# Altium PCB PCB.PcbDoc (part 1 of 4)
Units mm, origin at the board's own origin, x right, y up, seen from the top; angles counter-clockwise.
Board outline 38 x 42 mm, 4 copper layers (Top Layer, Inner GND 1, Inner GND 2, Bottom Layer), stack 1.62 mm thick; 195 components, 172 nets, 763 pads, 474 vias.
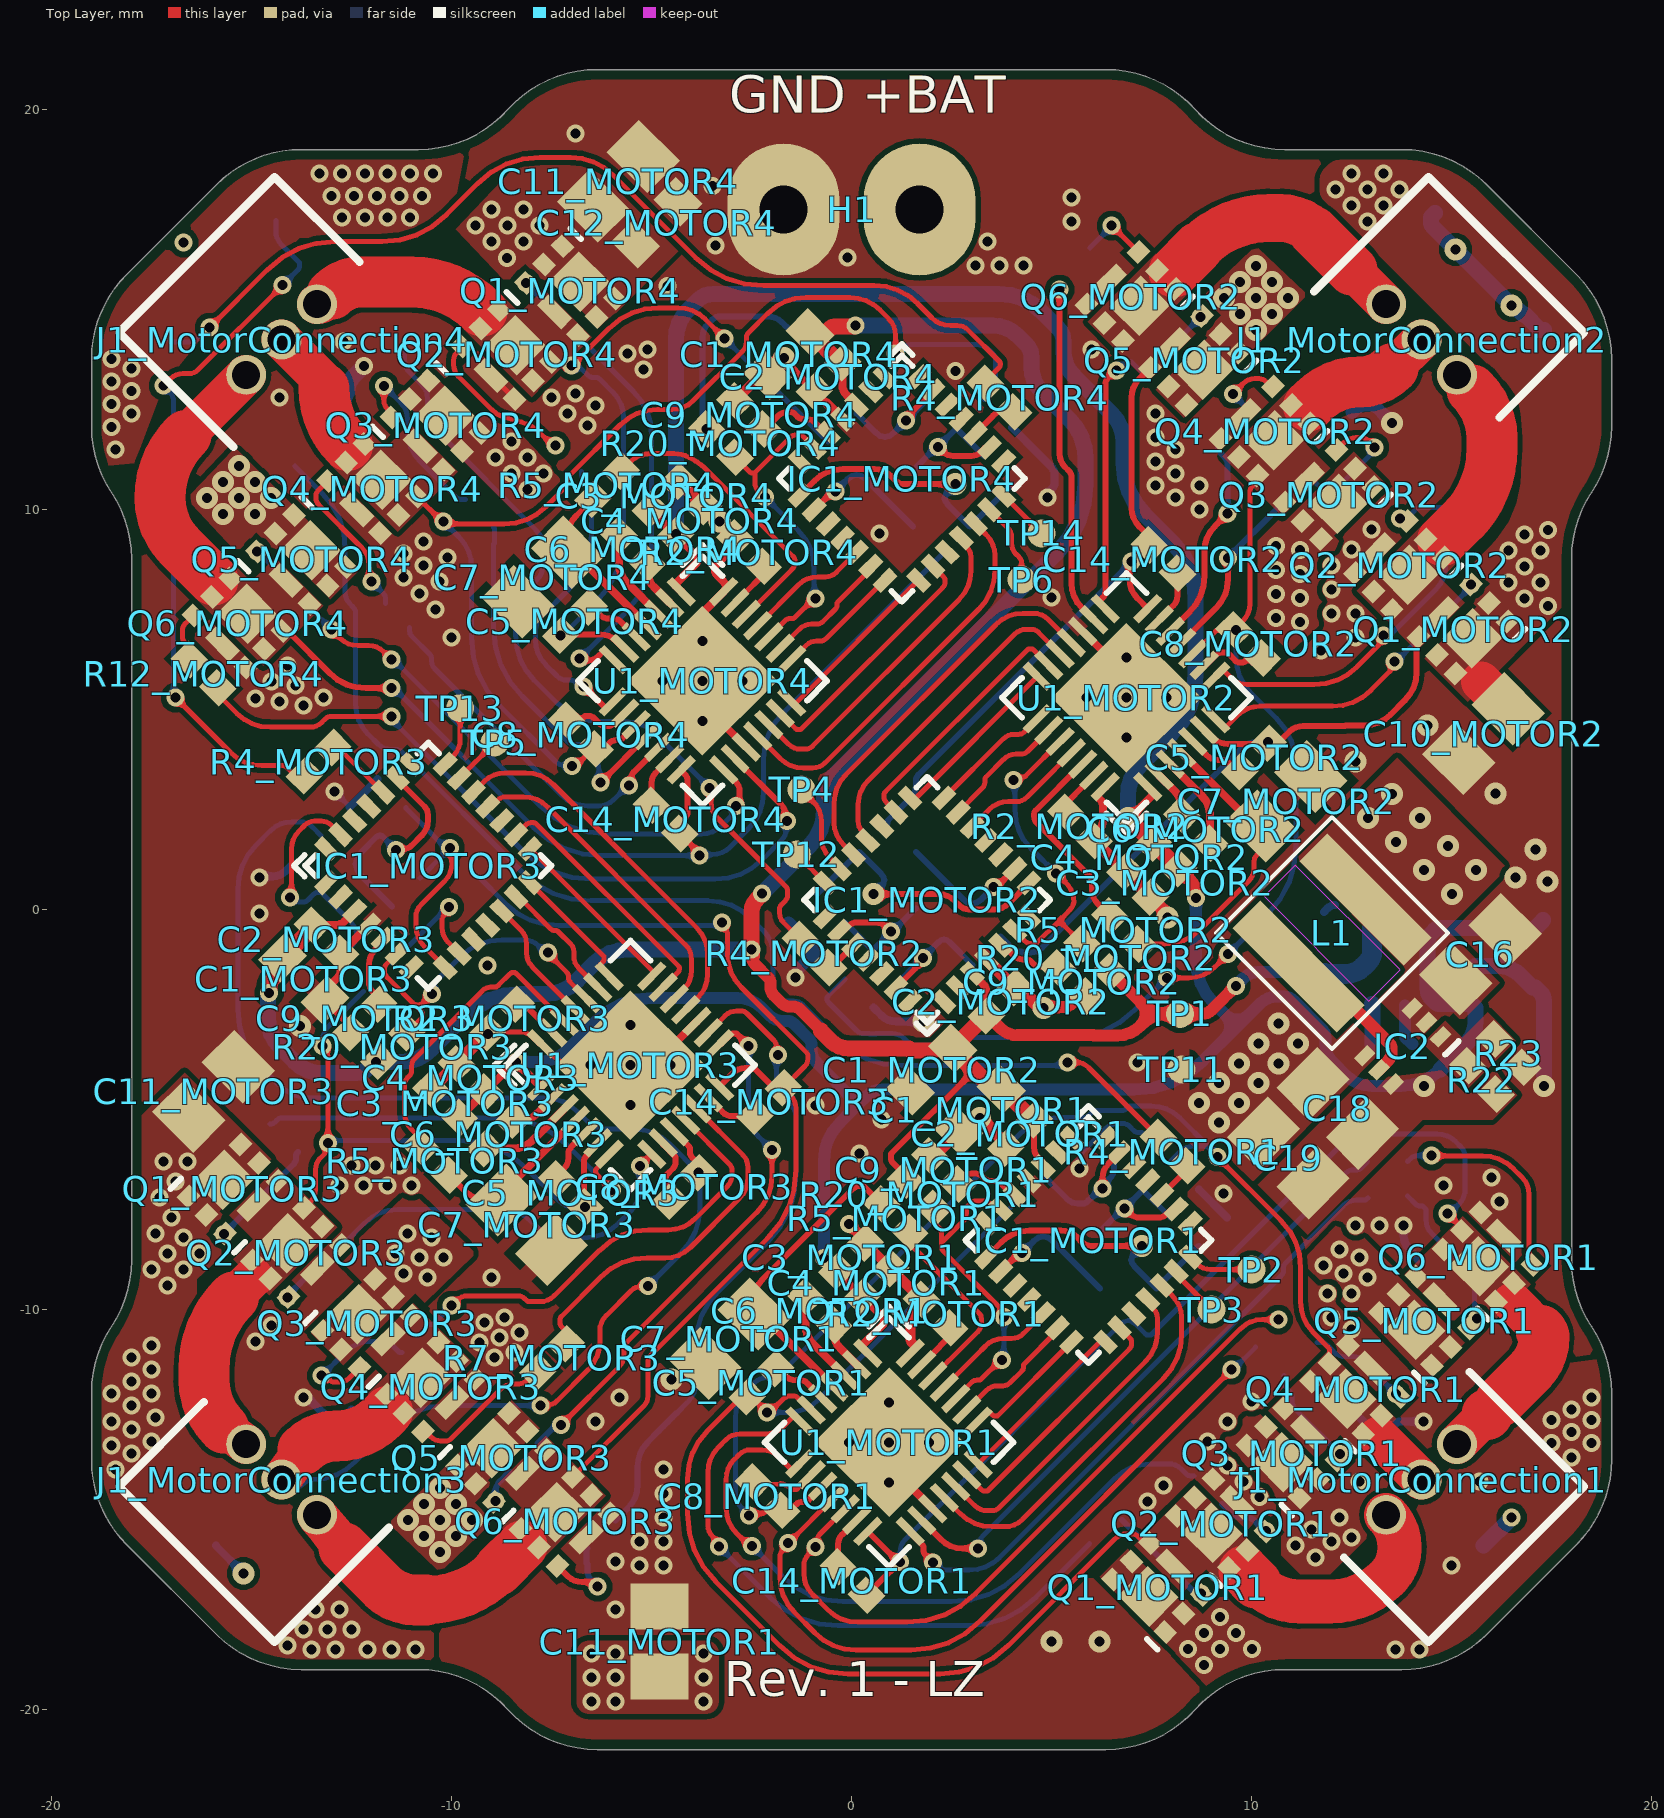
[diagram p0: Top Layer view]
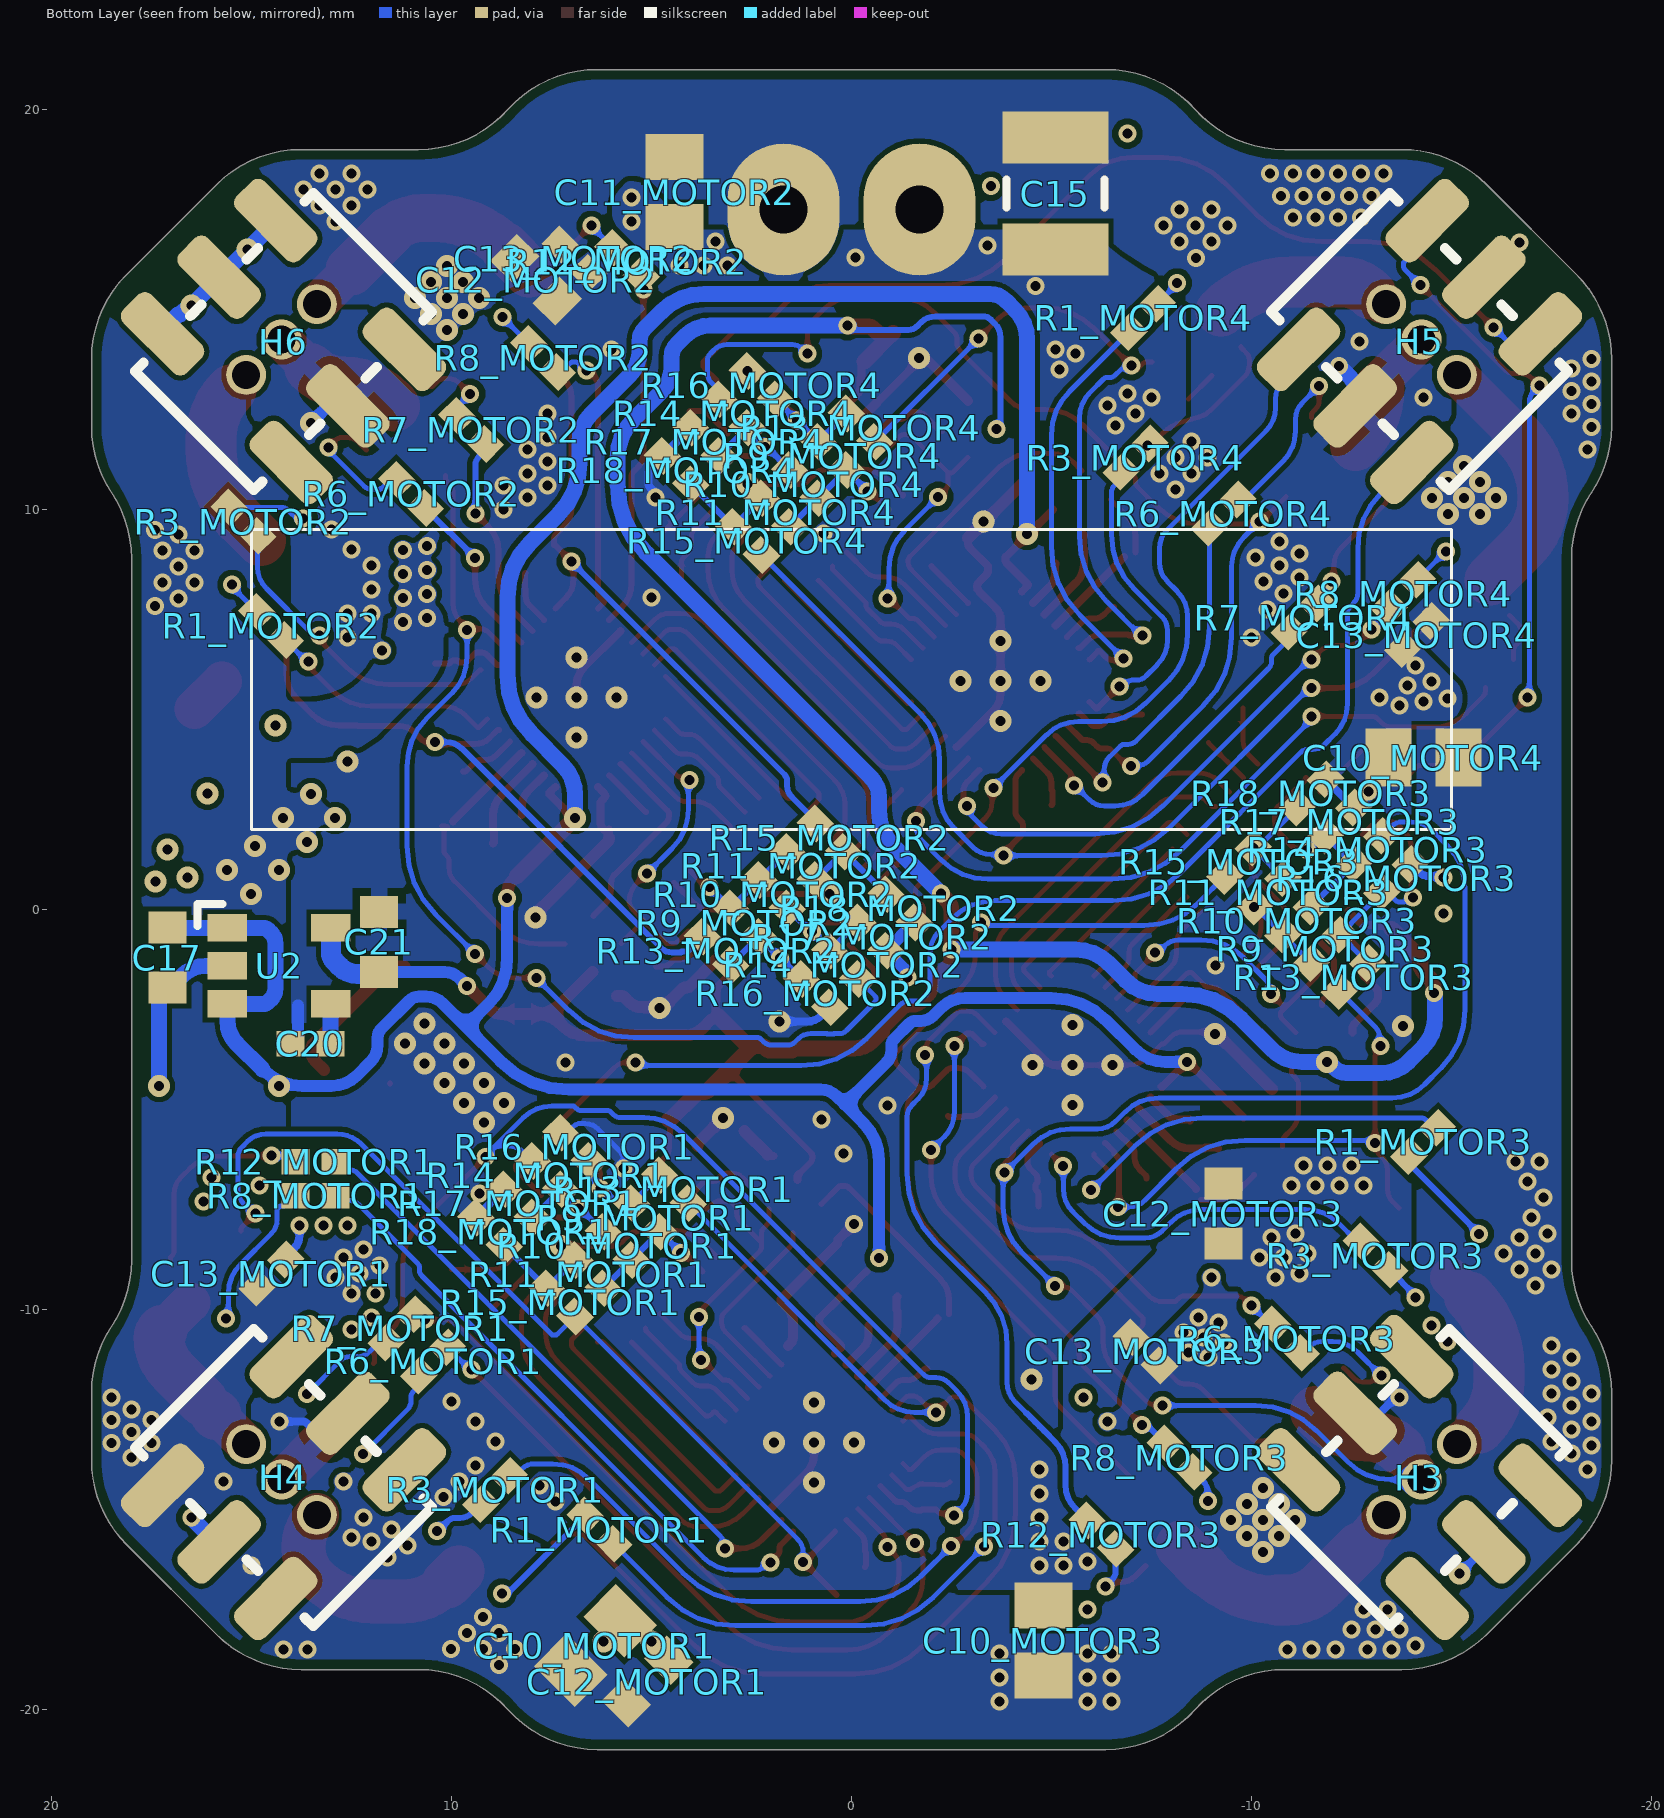
[diagram p1: Bottom Layer view, seen from below]
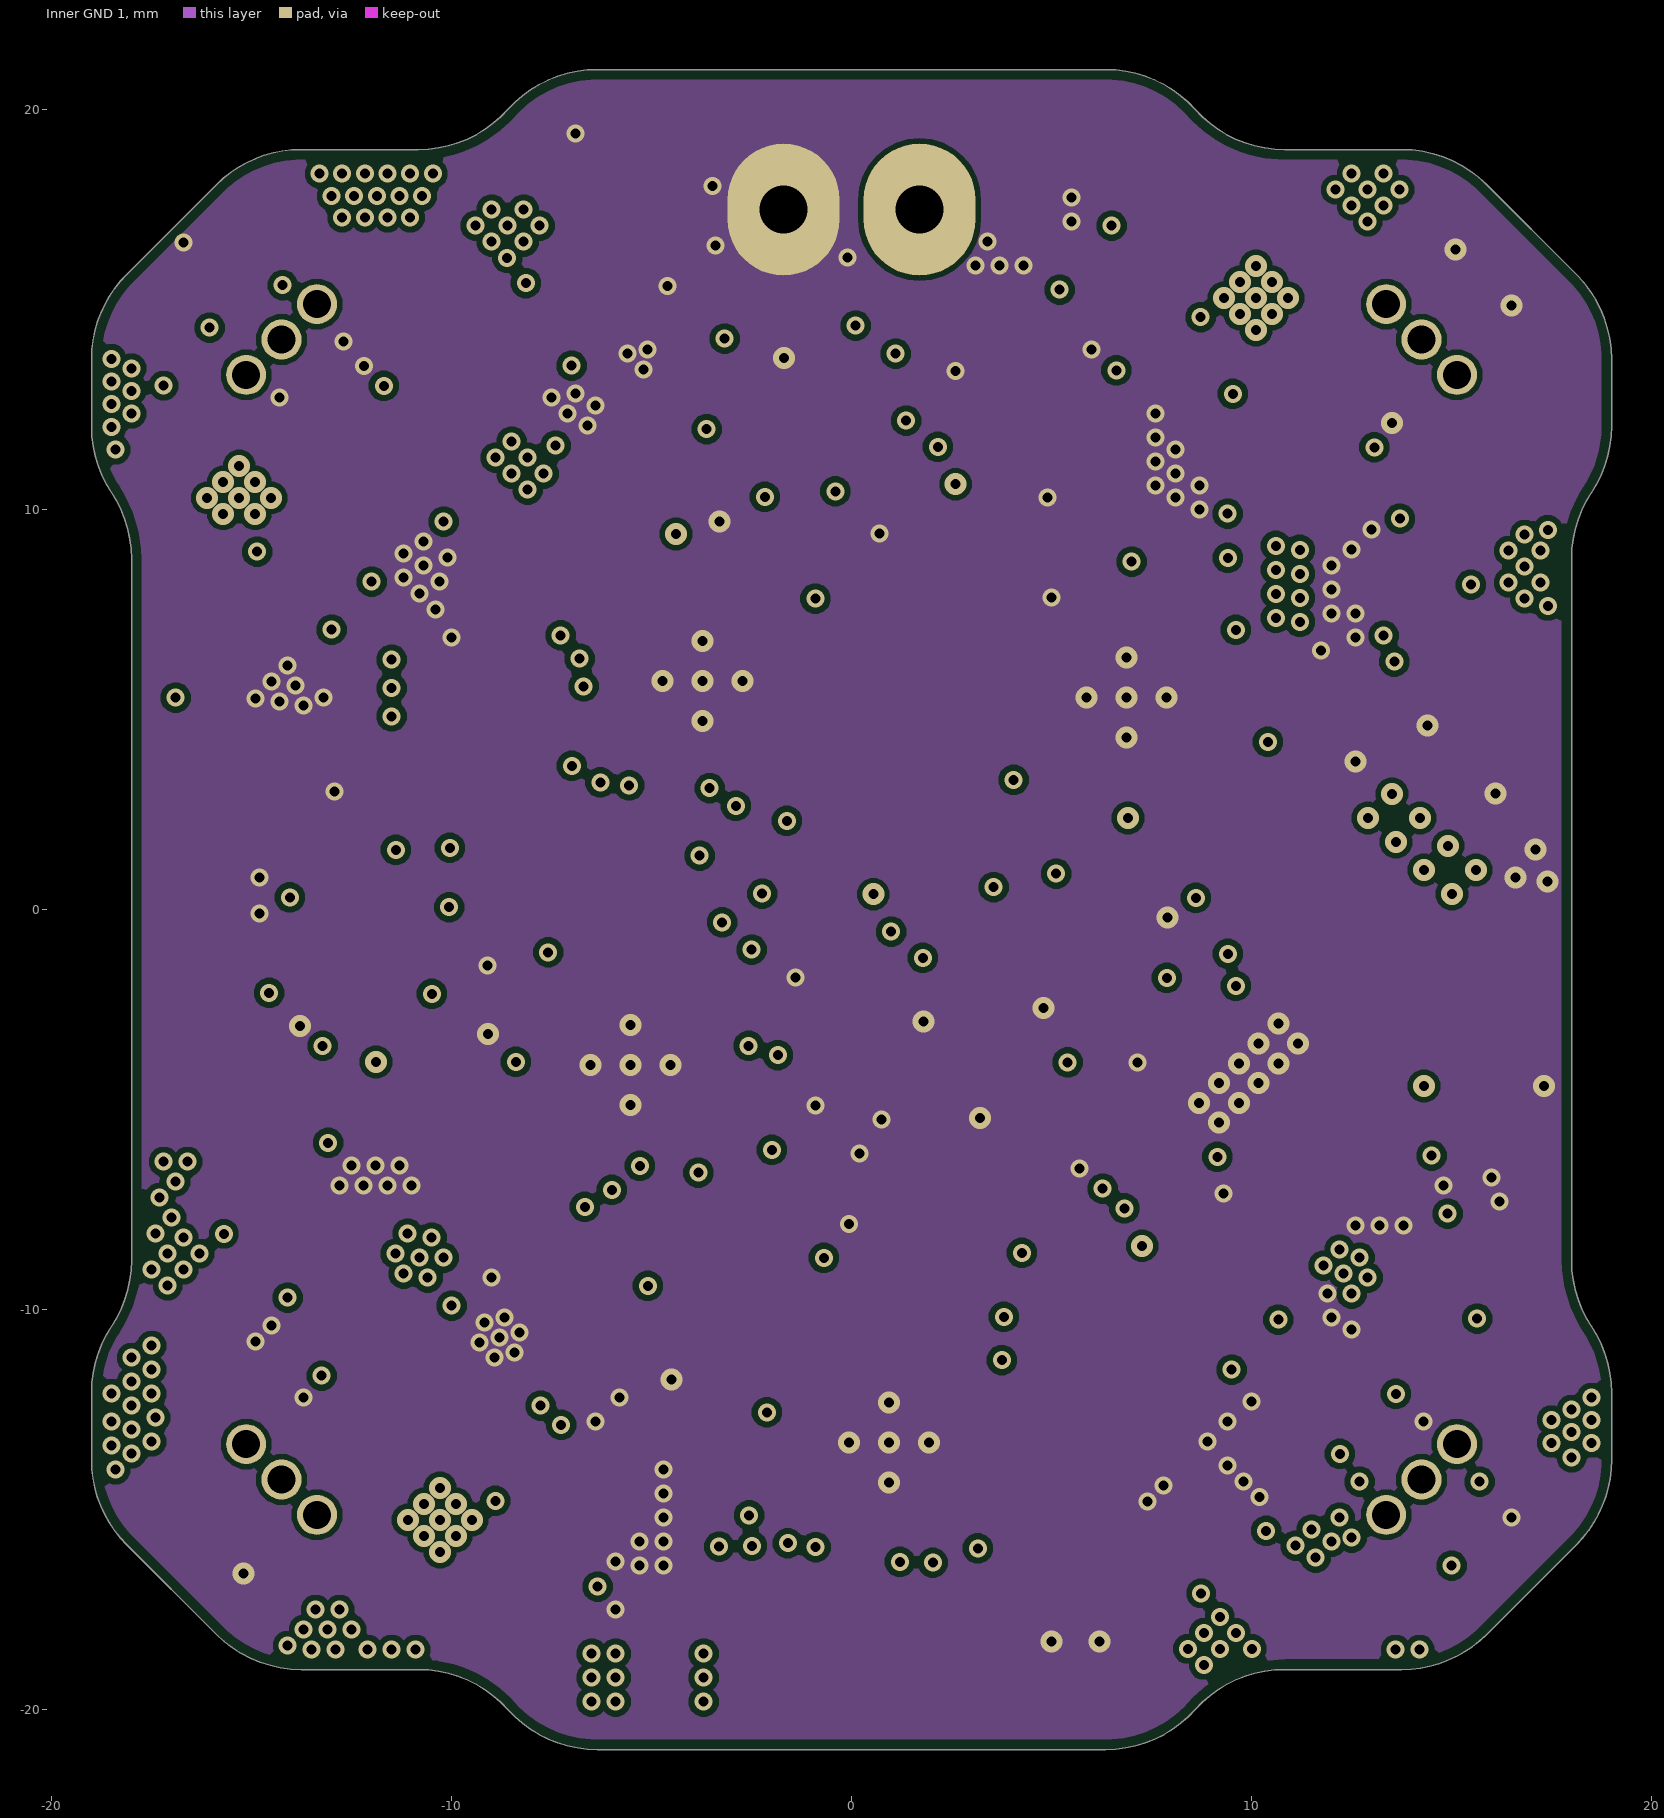
[diagram p2: Inner GND 1]
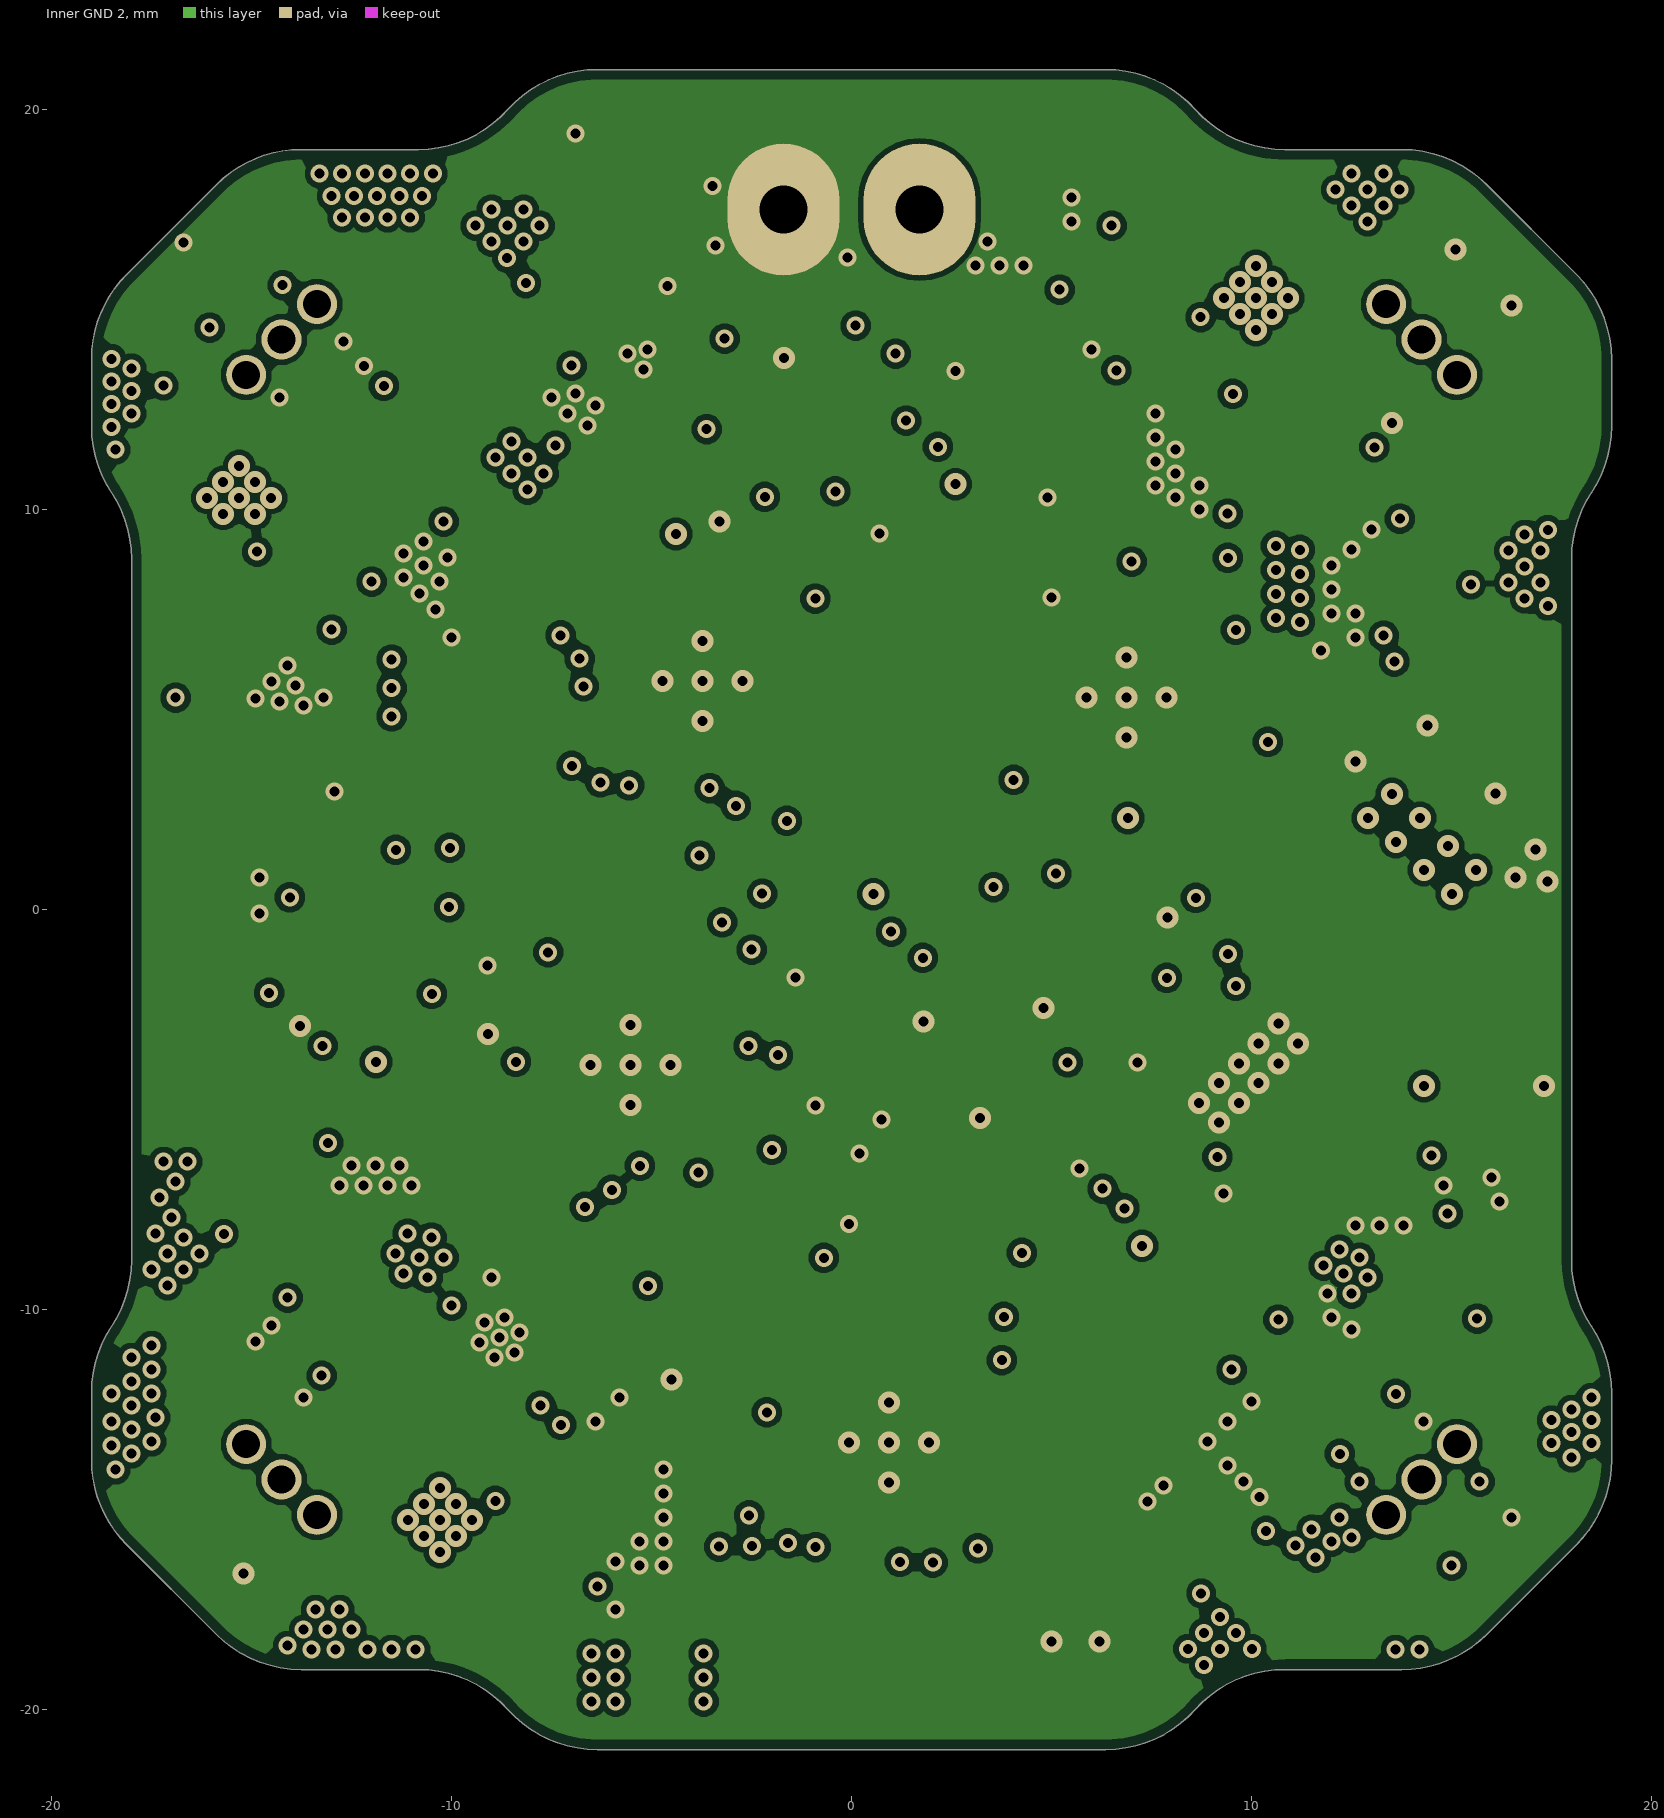
[diagram p3: Inner GND 2]

## Layer stack, top to bottom
Top Solder: solder mask 0.0102, Solder Resist, Dk 3.5
Top Layer: signal copper 0.035
Dielectric 2: prepreg 0.14, PP-006, Dk 4.1
Inner GND 1: signal copper 0.035
Dielectric 1: dielectric 1.2, FR-4, Dk 4.8
Inner GND 2: signal copper 0.035
Dielectric 3: prepreg 0.14, PP-006, Dk 4.1
Bottom Layer: signal copper 0.035
Bottom Solder: solder mask 0.0102, Solder Resist, Dk 3.5

## Board outline
-19.001,-13.756 -19.001,-12.079 cw(c-16.001,-12.079) -18.501,-10.421 ccw(c-21.001,-8.763) -18.001,-8.763 -18.001,8.765 ccw(c-21.001,8.765) -18.501,10.423 cw(c-16.001,12.082) -19.001,12.082 -19.001,13.758 cw(c-16.001,13.758) -18.123,15.88 -15.88,18.122 cw(c-13.759,16.001) -13.759,19.001 -10.83,19.001 ccw(c-10.83,22.001) -8.594,20.001 cw(c-6.358,18.001) -6.358,21.001 6.355,21.001 cw(c6.355,18.001) 8.591,20.001 ccw(c10.827,22.001) 10.827,19.001 13.756,19.001 cw(c13.756,16.001) 15.877,18.122 18.12,15.88 cw(c15.999,13.758) 18.999,13.758 18.999,12.082 cw(c15.999,12.082) 18.499,10.423 ccw(c20.999,8.765) 17.999,8.765 17.999,-8.763 ccw(c20.999,-8.763) 18.499,-10.421 cw(c15.999,-12.079) 18.999,-12.079 18.999,-13.756 cw(c15.999,-13.756) 18.12,-15.878 15.877,-18.12 cw(c13.756,-15.999) 13.756,-18.999 10.827,-18.999 ccw(c10.827,-21.999) 8.591,-19.999 cw(c6.355,-17.999) 6.355,-20.999 -6.358,-20.999 cw(c-6.358,-17.999) -8.594,-19.999 ccw(c-10.83,-21.999) -10.83,-18.999 -13.759,-18.999 cw(c-13.759,-15.999) -15.88,-18.12 -18.123,-15.878 cw(c-16.001,-13.756)

## Design rules (kind name [scope] priority, off if disabled: settings)
BoardOutlineClearance [All] p1: gap=0 ignorepadtopadclearanceinfootprint=FALSE except(0.2: Track-OutlineEdge Track-CavityEdge Track-CutoutEdge Track-SplitBarrior Track-SplitContinuation Via-OutlineEdge Via-CavityEdge Via-CutoutEdge Via-SplitBarrior Via-SplitContinuation Fill-OutlineEdge Fill-CavityEdge Fill-CutoutEdge Fill-SplitBarrior Fill-SplitContinuation; 0.25: Poly-OutlineEdge Poly-CavityEdge Poly-CutoutEdge Poly-SplitBarrior Poly-SplitContinuation)
Clearance Clearance_VBAT [InNet('+VBAT') AND OnLayer('Bottom Layer') AND InPoly vs NOT InPoly AND (NOT InNet('GND')) AND (NOT InNet('PHASE_*'))] p1 off: gap=0.3 ignorepadtopadclearanceinfootprint=FALSE
Clearance Clearance_NPTH [IsBoardCutoutRegion vs InNet('GND')] p2: gap=0.25 ignorepadtopadclearanceinfootprint=FALSE
Clearance Clearance_DiffUSB [InNet('MCU_USB_D_P') OR InNet('MCU_USB_D_N') OR InNet('USB_D_P') OR InNet('USB_D_N') or InNet('MCU_USB_TERM_D_N') or InNet('MCU_USB_TERM_D_P') vs InNet('GND')] p3: gap=0.7 ignorepadtopadclearanceinfootprint=FALSE except(0.089: SMDPad-THPad THPad-THPad; 0.127: Arc-Arc Arc-Track Arc-SMDPad Arc-THPad Arc-Text Track-Track Track-SMDPad Track-THPad Track-Text SMDPad-SMDPad SMDPad-Via SMDPad-Text THPad-Via THPad-Text Via-Text Fill-Text Poly-Text Region-Text Text-Text; 0.25: Arc-Hole Track-Hole SMDPad-Hole THPad-Hole Via-Hole Fill-Hole Poly-Hole Region-Hole Text-Hole; 0.254: Arc-Via Track-Via Via-Via)
Clearance Clearance_RF [InNet('RF') AND (IsTrack OR IsArc) vs (InNet('GND') AND InPoly)] p4: gap=0.5 ignorepadtopadclearanceinfootprint=FALSE except(0.089: SMDPad-THPad THPad-THPad; 0.127: Arc-Arc Arc-Track Arc-SMDPad Arc-THPad Arc-Text Track-Track Track-SMDPad Track-THPad Track-Text SMDPad-SMDPad SMDPad-Via SMDPad-Text THPad-Via THPad-Text Via-Text Fill-Text Poly-Text Region-Text Text-Text; 0.25: Arc-Hole Track-Hole SMDPad-Hole THPad-Hole Via-Hole Fill-Hole Poly-Hole Region-Hole Text-Hole; 0.254: Arc-Via Track-Via Via-Via)
Clearance [All] p5: gap=0.127 ignorepadtopadclearanceinfootprint=FALSE except(0.089: SMDPad-THPad THPad-THPad; 0.25: Arc-Hole Track-Hole SMDPad-Hole THPad-Hole Via-Hole Fill-Hole Poly-Hole Region-Hole Text-Hole)
ComponentClearance ComponentClearance_1 [HasFootprint('SX1280IMLTRT') vs HasFootprint('2450FM07D0034001T')] p1: gap=0.006 collisioncheckmode=3 verticalgap=0.254 showdistances=FALSE
ComponentClearance [All] p2: gap=0.127 collisioncheckmode=3 verticalgap=0.127 showdistances=FALSE
DiffPairsRouting [All] p1: maxlimit=0.254 minlimit=0.165 mostfreqgap=0.254 toplayer_maxgap=0.165 toplayer_prefgap=0.165 toplayer_minwidth=0.23 toplayer_maxwidth=0.23 toplayer_prefwidth=0.23 midlayer1_mingap=0.254 midlayer1_minwidth=0.381 midlayer1_maxwidth=0.381 midlayer1_prefwidth=0.381 midlayer2_mingap=0.254 midlayer2_minwidth=0.381 midlayer2_maxwidth=0.381 midlayer2_prefwidth=0.381 bottomlayer_mingap=0.254 bottomlayer_minwidth=0.381 bottomlayer_maxwidth=0.381 bottomlayer_prefwidth=0.381 maxuncoupledlength=12.7
MinimumAnnularRing [All] p1: minimumring=0.1
MinimumSolderMaskSliver [All] p1: minsoldermaskwidth=0.04
PlaneConnect [All] p1: planeconnectstyle=Direct reliefexpansion=0.508 reliefentries=4 reliefconductorwidth=0.254 reliefairgap=0.254
PolygonConnect PolygonConnect_GNDException [InNet('GND') vs InPadClass('GNDirect')] p1: connectstyle=Direct reliefconductorwidth=0.254 reliefentries=4 polygonreliefangle="90 Angle" airgapwidth=0.254
PolygonConnect PolygonConnect_Gnd [InNet('GND')] p2: thpad.connectstyle=Relief thpad.reliefconductorwidth=0.4 thpad.reliefentries=4 thpad.polygonreliefangle="90 Angle" thpad.airgapwidth=0.2 smdpad.connectstyle=Relief smdpad.reliefconductorwidth=0.4 smdpad.reliefentries=4 smdpad.polygonreliefangle="90 Angle" smdpad.airgapwidth=0.2 via.connectstyle=Direct via.reliefconductorwidth=0.4 via.reliefentries=4 via.polygonreliefangle="90 Angle" via.airgapwidth=0.2
PolygonConnect PolygonConnect_AllButGND [Not InNet('GND') vs Not InNet('GND')] p3: connectstyle=Direct reliefconductorwidth=0.254 reliefentries=4 polygonreliefangle="90 Angle" airgapwidth=0.254
RoomDefinition MOTOR1 [InComponentClass('MOTOR1')] p1: confinementstyle=ConfineIn formatcopy=TRUE lockcomponents=FALSE outline -5.952,-20.152 -5.952,-16.448 -5.179,-11.224 -2.56,-8.605 3.666,-3.276 14.577,-5.648 15.842,-6.671 17.93,-8.76 8.524,-18.895 6.895,-20.524 5.557,-21.033
RoomDefinition MOTOR4 [InComponentClass('MOTOR4')] p2: confinementstyle=ConfineIn formatcopy=TRUE lockcomponents=FALSE outline -17.493,6.271 -17.357,7.233 -7.952,17.714 -5.332,20.333 3.329,14.093 4.993,12.429 5.662,11.359 5.185,10.775 -3.353,1.884 -4.275,0.962 -16.152,2.648
RoomDefinition MOTOR3 [InComponentClass('MOTOR3')] p3: confinementstyle=ConfineIn formatcopy=TRUE lockcomponents=FALSE outline -18.073,-5.043 -14.618,3.329 -12.954,4.993 -10.583,5.023 -1.691,-3.516 -0.769,-4.438 -3.648,-20.127 -5.952,-20.127 -17.487,-7.055
RoomDefinition MOTOR2 [InComponentClass('MOTOR2')] p4: confinementstyle=ConfineIn formatcopy=TRUE lockcomponents=FALSE outline -2.516,-0.342 3.268,19.787 5.572,19.787 8.344,17.479 15.571,10.993 16.493,10.071 17.924,4.895 15.305,2.276 1.543,-5.733 0.267,-4.457
RoutingVias [All] p1: holewidth=0.25 width=0.55 viastyle="Through Hole" minholewidth=0.2 minwidth=0.45 maxholewidth=0.35 maxwidth=0.7
SilkToSilkClearance [All] p1: silktosilkclearance=0.15
SilkToSolderMaskClearance [IsPad] p1: minsilkscreentomaskgap=0.075 clearancetoexposedcopper=TRUE
SolderMaskExpansion [All] p1: expansion=0.038 istentingtop=FALSE
SupplyNets "Schematic Supply Nets_3" [InNet('+3V3')] p1: voltage=0.000
SupplyNets "Schematic Supply Nets_2" [InNet('+VBAT')] p2: voltage=0.000
SupplyNets "Schematic Supply Nets_1" [InNet('GND')] p3: voltage=0.000
SupplyNets "Schematic Supply Nets" [InNet('+5V')] p4: voltage=0.000
Width Width_RF [InNet('RF')] p1: maxlimit=0.25 minlimit=0.111 preferedwidth=0.25 toplayer_minwidth=0.25 midlayer1_maxwidth=0.111 midlayer1_prefwidth=0.111 midlayer2_maxwidth=0.111 midlayer2_prefwidth=0.111 bottomlayer_minwidth=0.25 impedanceprofiledriven=TRUE impedanceprofileid={F64C656D-1B4E-4BC5-BB87-F1306D944459} impedanceprofilevalue=50.000000 minimp=50.000000 maximp=50.000000 favimp=50.000000
Width [All] p2: maxlimit=1.3 minlimit=0.12 preferedwidth=0.254 toplayer_prefwidth=0.15 midlayer1_prefwidth=0.15 midlayer2_minwidth=0.2 bottomlayer_prefwidth=0.15 minimp=50.000000 maximp=50.000000 favimp=50.000000
24 further rules are at their usual default settings.

## Classes and differential pairs
net class STM_SWCLK[1..4]: STM_SWCLK1 STM_SWCLK2 STM_SWCLK3 STM_SWCLK4
polygon class GNDirectPoly: GND_BRIDGES2
pad class GNDirect: C10_MOTOR1-1 C10_MOTOR1-2 C10_MOTOR2-1 C10_MOTOR2-2 C10_MOTOR3-1 C10_MOTOR3-2 C10_MOTOR4-1 C10_MOTOR4-2 C11_MOTOR1-1 C11_MOTOR1-2 C11_MOTOR2-1 C11_MOTOR2-2 C11_MOTOR3-1 C11_MOTOR3-2 C11_MOTOR4-1 C11_MOTOR4-2 C12_MOTOR1-1 C12_MOTOR1-2 C12_MOTOR2-1 C12_MOTOR2-2 C12_MOTOR3-1 C12_MOTOR3-2 C12_MOTOR4-1 C12_MOTOR4-2 C13_MOTOR1-1 C13_MOTOR1-2 C13_MOTOR2-1 C13_MOTOR2-2 C13_MOTOR3-1 C13_MOTOR3-2 C13_MOTOR4-1 C13_MOTOR4-2 C15-1 C16-1 C18-1 C19-1 H1-1 IC2-4 Q2_MOTOR1-4 Q2_MOTOR1-8 Q2_MOTOR2-4 Q2_MOTOR2-8 Q2_MOTOR3-4 Q2_MOTOR3-8 Q2_MOTOR4-4 Q2_MOTOR4-8 Q4_MOTOR1-4 Q4_MOTOR1-8 Q4_MOTOR2-4 Q4_MOTOR2-8 Q4_MOTOR3-4 Q4_MOTOR3-8 Q4_MOTOR4-4 Q4_MOTOR4-8 Q6_MOTOR1-4 Q6_MOTOR1-8 Q6_MOTOR2-4 Q6_MOTOR2-8 Q6_MOTOR3-4 Q6_MOTOR3-8 Q6_MOTOR4-4 Q6_MOTOR4-8 R23-1
channel class MotorConnection: MotorConnection1 MotorConnection2 MotorConnection3 MotorConnection4
component class MotorConnection4: J1_MotorConnection4
component class MotorConnection3: J1_MotorConnection3
component class MotorConnection2: J1_MotorConnection2
component class MotorConnection1: J1_MotorConnection1
net class STM_SWDIO[1..4]: STM_SWDIO1 STM_SWDIO2 STM_SWDIO3 STM_SWDIO4
net class STM_nRESET[1..4]: STM_nRESET1 STM_nRESET2 STM_nRESET3 STM_nRESET4
net class STM_DSHOT[1..4]: STM_DSHOT1 STM_DSHOT2 STM_DSHOT3 STM_DSHOT4
net class PHASE_C[1..4]: PHASE_C1 PHASE_C2 PHASE_C3 PHASE_C4
net class PHASE_B[1..4]: PHASE_B1 PHASE_B2 PHASE_B3 PHASE_B4
net class PHASE_A[1..4]: PHASE_A1 PHASE_A2 PHASE_A3 PHASE_A4
channel class MotorDriverChannel: MOTOR1 MOTOR2 MOTOR3 MOTOR4
component class MOTOR4: C1_MOTOR4 C2_MOTOR4 C3_MOTOR4 C4_MOTOR4 C5_MOTOR4 C6_MOTOR4 C7_MOTOR4 C8_MOTOR4 C9_MOTOR4 C10_MOTOR4 C11_MOTOR4 C12_MOTOR4 C13_MOTOR4 C14_MOTOR4 IC1_MOTOR4 Q1_MOTOR4 Q2_MOTOR4 Q3_MOTOR4 Q4_MOTOR4 Q5_MOTOR4 Q6_MOTOR4 R1_MOTOR4 R2_MOTOR4 R3_MOTOR4 R4_MOTOR4 R5_MOTOR4 R6_MOTOR4 R7_MOTOR4 R8_MOTOR4 R9_MOTOR4 R10_MOTOR4 R11_MOTOR4 R12_MOTOR4 R13_MOTOR4 R14_MOTOR4 R15_MOTOR4 R16_MOTOR4 R17_MOTOR4 R18_MOTOR4 R20_MOTOR4 U1_MOTOR4
component class MOTOR3: C1_MOTOR3 C2_MOTOR3 C3_MOTOR3 C4_MOTOR3 C5_MOTOR3 C6_MOTOR3 C7_MOTOR3 C8_MOTOR3 C9_MOTOR3 C10_MOTOR3 C11_MOTOR3 C12_MOTOR3 C13_MOTOR3 C14_MOTOR3 IC1_MOTOR3 Q1_MOTOR3 Q2_MOTOR3 Q3_MOTOR3 Q4_MOTOR3 Q5_MOTOR3 Q6_MOTOR3 R1_MOTOR3 R2_MOTOR3 R3_MOTOR3 R4_MOTOR3 R5_MOTOR3 R6_MOTOR3 R7_MOTOR3 R8_MOTOR3 R9_MOTOR3 R10_MOTOR3 R11_MOTOR3 R12_MOTOR3 R13_MOTOR3 R14_MOTOR3 R15_MOTOR3 R16_MOTOR3 R17_MOTOR3 R18_MOTOR3 R20_MOTOR3 U1_MOTOR3
component class MOTOR2: C1_MOTOR2 C2_MOTOR2 C3_MOTOR2 C4_MOTOR2 C5_MOTOR2 C6_MOTOR2 C7_MOTOR2 C8_MOTOR2 C9_MOTOR2 C10_MOTOR2 C11_MOTOR2 C12_MOTOR2 C13_MOTOR2 C14_MOTOR2 IC1_MOTOR2 Q1_MOTOR2 Q2_MOTOR2 Q3_MOTOR2 Q4_MOTOR2 Q5_MOTOR2 Q6_MOTOR2 R1_MOTOR2 R2_MOTOR2 R3_MOTOR2 R4_MOTOR2 R5_MOTOR2 R6_MOTOR2 R7_MOTOR2 R8_MOTOR2 R9_MOTOR2 R10_MOTOR2 R11_MOTOR2 R12_MOTOR2 R13_MOTOR2 R14_MOTOR2 R15_MOTOR2 R16_MOTOR2 R17_MOTOR2 R18_MOTOR2 R20_MOTOR2 U1_MOTOR2
component class MOTOR1: C1_MOTOR1 C2_MOTOR1 C3_MOTOR1 C4_MOTOR1 C5_MOTOR1 C6_MOTOR1 C7_MOTOR1 C8_MOTOR1 C9_MOTOR1 C10_MOTOR1 C11_MOTOR1 C12_MOTOR1 C13_MOTOR1 C14_MOTOR1 IC1_MOTOR1 Q1_MOTOR1 Q2_MOTOR1 Q3_MOTOR1 Q4_MOTOR1 Q5_MOTOR1 Q6_MOTOR1 R1_MOTOR1 R2_MOTOR1 R3_MOTOR1 R4_MOTOR1 R5_MOTOR1 R6_MOTOR1 R7_MOTOR1 R8_MOTOR1 R9_MOTOR1 R10_MOTOR1 R11_MOTOR1 R12_MOTOR1 R13_MOTOR1 R14_MOTOR1 R15_MOTOR1 R16_MOTOR1 R17_MOTOR1 R18_MOTOR1 R20_MOTOR1 U1_MOTOR1
component class U_Interfacing: H3 H4 H5 H6 TP1 TP2 TP3 TP4 TP5 TP6 TP11 TP12 TP13 TP14
component class U_Power: C15 C16 C17 C18 C19 C20 C21 H1 IC2 L1 R22 R23 U2

## Components (designator, comment, footprint, x,y, rotation, side; value= is the part's Value field where it differs from the comment)
C1_MOTOR1 "4u7" CAP_0603_L 3.209,-5.009 r45 top (schematic designator C1)
C1_MOTOR2 "4u7" CAP_0603_L 2,-4 r45 top (schematic designator C1)
C1_MOTOR3 "4u7" CAP_0603_L -13.694,-1.733 r135 top (schematic designator C1)
C1_MOTOR4 "4u7" CAP_0603_L -1.571,13.887 r45 top (schematic designator C1)
C2_MOTOR1 "100n" CAP_0402 4.209,-5.609 r45 top (schematic designator C2)
C2_MOTOR2 "100n" CAP_0402 3.727,-2.304 r225 top (schematic designator C2)
C2_MOTOR3 "100n" CAP_0402 -13.129,-0.743 r135 top (schematic designator C2)
C2_MOTOR4 "100n" CAP_0402 -0.581,13.321 r45 top (schematic designator C2)
C3_MOTOR1 "1u" CAP_0402 -0.018,-8.689 r225 top (schematic designator C3)
C3_MOTOR2 "1u" CAP_0402 7.828,0.666 r45 top (schematic designator C3)
C3_MOTOR3 "1u" CAP_0402 -10.159,-4.844 r315 top (schematic designator C3)
C3_MOTOR4 "1u" CAP_0402 -4.682,10.351 r225 top (schematic designator C3)
C4_MOTOR1 "100n" CAP_0402 0.619,-9.326 r225 top (schematic designator C4)
C4_MOTOR2 "100n" CAP_0402 7.191,1.302 r45 top (schematic designator C4)
C4_MOTOR3 "100n" CAP_0402 -9.522,-4.208 r315 top (schematic designator C4)
C4_MOTOR4 "100n" CAP_0402 -4.046,9.715 r225 top (schematic designator C4)
C5_MOTOR1 "100n" CAP_0402 -2.255,-11.829 r45 top (schematic designator C5)
C5_MOTOR2 "100n" CAP_0402 10.065,3.806 r225 top (schematic designator C5)
C5_MOTOR3 "100n" CAP_0402 -7.019,-7.081 r135 top (schematic designator C5)
C5_MOTOR4 "100n" CAP_0402 -6.919,7.211 r45 top (schematic designator C5)
C6_MOTOR1 "470n" CAP_0402 -0.796,-10.033 r135 top (schematic designator C6)
C6_MOTOR2 "470n" CAP_0402 8.606,2.009 r315 top (schematic designator C6)
C6_MOTOR3 "470n" CAP_0402 -8.815,-5.622 r225 top (schematic designator C6)
C6_MOTOR4 "470n" CAP_0402 -5.46,9.008 r135 top (schematic designator C6)
C7_MOTOR1 "10u" CAP_0805s -3.055,-10.729 r45 top (schematic designator C7)
C7_MOTOR2 "10u" CAP_0805s 10.865,2.706 r225 top (schematic designator C7)
C7_MOTOR3 "10u" CAP_0805s -8.119,-7.881 r135 top (schematic designator C7)
C7_MOTOR4 "10u" CAP_0805s -7.719,8.311 r45 top (schematic designator C7)
C8_MOTOR1 "100n" CAP_0402 -2.104,-14.664 r135 top (schematic designator C8)
C8_MOTOR2 "100n" CAP_0402 9.914,6.641 r315 top (schematic designator C8)
C8_MOTOR3 "100n" CAP_0402 -4.184,-6.93 r225 top (schematic designator C8)
C8_MOTOR4 "100n" CAP_0402 -6.768,4.376 r135 top (schematic designator C8)
C9_MOTOR1 "100n" CAP_0402 2.309,-6.509 r315 top (schematic designator C9)
C9_MOTOR2 "100n" CAP_0402 5.509,-1.809 r135 top (schematic designator C9)
C9_MOTOR3 "100n" CAP_0402 -12.174,-2.723 r45 top (schematic designator C9)
C9_MOTOR4 "100n" CAP_0402 -2.561,12.366 r315 top (schematic designator C9)
C10_MOTOR1 "22uF" CAP_0805s 6.4,-18.4 r315 bottom (schematic designator C10)
C10_MOTOR2 "22uF" CAP_0805s 15.8,4.4 r45 top (schematic designator C10)
C10_MOTOR3 "22uF" CAP_0805s -4.8,-18.275 r270 bottom (schematic designator C10)
C10_MOTOR4 "22uF" CAP_0805s -14.3,3.8 r180 bottom (schematic designator C10)
C11_MOTOR1 "22uF" CAP_0805s -4.8,-18.3 r270 top (schematic designator C11)
C11_MOTOR2 "22uF" CAP_0805s 4.42,17.935 r90 bottom (schematic designator C11)
C11_MOTOR3 "22uF" CAP_0805s -15.949,-4.548 r225 top (schematic designator C11)
C11_MOTOR4 "22uF" CAP_0805s -5.827,18.209 r225 top (schematic designator C11)
C12_MOTOR1 "1u" CAP_0603_L 5.1,-19.3 r315 bottom (schematic designator C12)
C12_MOTOR2 "1u" CAP_0603_L 7.887,15.746 r45 bottom (schematic designator C12)
C12_MOTOR3 "1u" CAP_0603_L -9.3,-7.6 r270 bottom (schematic designator C12)
C12_MOTOR4 "1u" CAP_0603_L -4.871,17.168 r225 top (schematic designator C12)
C13_MOTOR1 "100n" CAP_0402 14.5,-9.1 r315 bottom (schematic designator C13)
C13_MOTOR2 "100n" CAP_0402 6.926,16.271 r45 bottom (schematic designator C13)
C13_MOTOR3 "100n" CAP_0402 -7.346,-11.046 r45 bottom (schematic designator C13)
C13_MOTOR4 "100n" CAP_0402 -14.137,6.859 r135 bottom (schematic designator C13)
C14_MOTOR1 "100n" CAP_0402 0.018,-16.786 r135 top (schematic designator C14)
C14_MOTOR2 "100n" CAP_0402 7.792,8.762 r315 top (schematic designator C14)
C14_MOTOR3 "100n" CAP_0402 -2.062,-4.809 r225 top (schematic designator C14)
C14_MOTOR4 "100n" CAP_0402 -4.647,2.255 r135 top (schematic designator C14)
C15 "100u" CAP_1210 -5.1,17.9 r90 bottom
C16 "10u" CAP_0805s 15.723,-1.117 r225 top
C17 "2u2" CAP_0603_L 17.101,-1.2 r90 bottom
C18 "22uF" CAP_0805s 12.155,-4.971 r315 top
C19 "22uF" CAP_0805s 10.918,-6.208 r315 top
C20 "100n" CAP_0402 13.529,-3.356 r180 bottom
C21 "2u2" CAP_0603_L 11.809,-0.809 r270 bottom
H1 "BatteryWireSoldering" BatteryWireSoldering 0,17.5 r0 top
H3 "NRPN032MAMS-RC" NRPN032MAMS-RC -14.2,-14.2 r135 bottom locked
H4 "NRPN032MAMS-RC" NRPN032MAMS-RC 14.2,-14.2 r225 bottom locked
H5 "NRPN032MAMS-RC" NRPN032MAMS-RC -14.2,14.2 r225 bottom locked
H6 "NRPN032MAMS-RC" NRPN032MAMS-RC 14.2,14.2 r135 bottom locked
IC1_MOTOR1 "STM32G071GBU6" UFQFN28-STM32 5.922,-8.265 r315 top (schematic designator IC1)
IC1_MOTOR2 "STM32G071GBU6" UFQFN28-STM32 1.888,0.242 r135 top (schematic designator IC1)
IC1_MOTOR3 "STM32G071GBU6" UFQFN28-STM32 -10.583,1.095 r45 top (schematic designator IC1)
IC1_MOTOR4 "STM32G071GBU6" UFQFN28-STM32 1.258,10.775 r315 top (schematic designator IC1)
IC2 "TPS61023DRLT" SOTFL50P160X60-6N 13.778,-3.415 r225 top
J1_MotorConnection1 "53048-0310" SHDRRA3W35P0X125_1X3_550X550X350P 14.25,-14.25 r225 top locked (schematic designator J1)
J1_MotorConnection2 "53048-0310" SHDRRA3W35P0X125_1X3_550X550X350P 14.25,14.25 r315 top locked (schematic designator J1)
J1_MotorConnection3 "53048-0310" SHDRRA3W35P0X125_1X3_550X550X350P -14.25,-14.25 r135 top locked (schematic designator J1)
J1_MotorConnection4 "53048-0310" SHDRRA3W35P0X125_1X3_550X550X350P -14.25,14.25 r45 top locked (schematic designator J1)
L1 "1u" 74438357010 12.01,-0.587 r45 top
Q1_MOTOR1 "CSD15571Q2" CSD15571Q2 7.649,-16.945 r45 top (schematic designator Q1)
Q1_MOTOR2 "CSD15571Q2" CSD15571Q2 15.288,7.013 r135 top (schematic designator Q1)
Q1_MOTOR3 "CSD15571Q2" CSD15571Q2 -15.469,-6.984 r315 top (schematic designator Q1)
Q1_MOTOR4 "CSD15571Q2" CSD15571Q2 -7.031,15.471 r225 top (schematic designator Q1)
Q2_MOTOR1 "CSD15571Q2" CSD15571Q2 9.24,-15.354 r45 top (schematic designator Q2)
Q2_MOTOR2 "CSD15571Q2" CSD15571Q2 13.697,8.604 r135 top (schematic designator Q2)
Q2_MOTOR3 "CSD15571Q2" CSD15571Q2 -13.878,-8.575 r315 top (schematic designator Q2)
Q2_MOTOR4 "CSD15571Q2" CSD15571Q2 -8.622,13.88 r225 top (schematic designator Q2)
Q3_MOTOR1 "CSD15571Q2" CSD15571Q2 11.008,-13.587 r45 top (schematic designator Q3)
Q3_MOTOR2 "CSD15571Q2" CSD15571Q2 11.93,10.372 r135 top (schematic designator Q3)
Q3_MOTOR3 "CSD15571Q2" CSD15571Q2 -12.111,-10.343 r315 top (schematic designator Q3)
Q3_MOTOR4 "CSD15571Q2" CSD15571Q2 -10.39,12.112 r225 top (schematic designator Q3)
Q4_MOTOR1 "CSD15571Q2" CSD15571Q2 12.599,-11.996 r45 top (schematic designator Q4)
Q4_MOTOR2 "CSD15571Q2" CSD15571Q2 10.339,11.963 r135 top (schematic designator Q4)
Q4_MOTOR3 "CSD15571Q2" CSD15571Q2 -10.519,-11.934 r315 top (schematic designator Q4)
Q4_MOTOR4 "CSD15571Q2" CSD15571Q2 -11.981,10.521 r225 top (schematic designator Q4)
Q5_MOTOR1 "CSD15571Q2" CSD15571Q2 14.321,-10.28 r45 top (schematic designator Q5)
Q5_MOTOR2 "CSD15571Q2" CSD15571Q2 8.571,13.731 r135 top (schematic designator Q5)
Q5_MOTOR3 "CSD15571Q2" CSD15571Q2 -8.752,-13.702 r315 top (schematic designator Q5)
Q5_MOTOR4 "CSD15571Q2" CSD15571Q2 -13.748,8.753 r225 top (schematic designator Q5)
Q6_MOTOR1 "CSD15571Q2" CSD15571Q2 15.912,-8.689 r45 top (schematic designator Q6)
Q6_MOTOR2 "CSD15571Q2" CSD15571Q2 6.98,15.322 r135 top (schematic designator Q6)
Q6_MOTOR3 "CSD15571Q2" CSD15571Q2 -7.161,-15.293 r315 top (schematic designator Q6)
Q6_MOTOR4 "CSD15571Q2" CSD15571Q2 -15.339,7.162 r225 top (schematic designator Q6)
R1_MOTOR1 "4R7" RES_0402 6.3,-15.5 r45 bottom (schematic designator R1)
R1_MOTOR2 "4R7" RES_0402 14.509,7.091 r45 bottom (schematic designator R1)
R1_MOTOR3 "4R7" RES_0402 -14.291,-5.809 r315 bottom (schematic designator R1)
R1_MOTOR4 "4R7" RES_0402 -7.291,14.791 r135 bottom (schematic designator R1)
R2_MOTOR1 "0R" RES_0402 2.104,-10.104 r315 top (schematic designator R2)
R2_MOTOR2 "0R" RES_0402 5.707,2.08 r135 top (schematic designator R2)
R2_MOTOR3 "0R" RES_0402 -8.744,-2.723 r45 top (schematic designator R2)
R2_MOTOR4 "0R" RES_0402 -2.561,8.937 r315 top (schematic designator R2)
R3_MOTOR1 "4R7" RES_0402 8.909,-14.509 r315 bottom (schematic designator R3)
R3_MOTOR2 "4R7" RES_0402 15.2,9.7 r45 bottom (schematic designator R3)
R3_MOTOR3 "4R7" RES_0402 -13.099,-8.652 r225 bottom (schematic designator R3)
R3_MOTOR4 "4R7" RES_0402 -7.1,11.3 r135 bottom (schematic designator R3)
R4_MOTOR1 "2k2" RES_0402 8.028,-6.051 r135 top (schematic designator R4)
R4_MOTOR2 "2k2" RES_0402 -0.929,-1.094 r135 top (schematic designator R4)
R4_MOTOR3 "2k2" RES_0402 -13.325,3.7 r225 top (schematic designator R4)
R4_MOTOR4 "2k2" RES_0402 3.7,12.8 r135 top (schematic designator R4)
R5_MOTOR1 "100k" RES_0402 1.104,-7.714 r135 top (schematic designator R5)
R5_MOTOR2 "100k" RES_0402 6.809,-0.509 r315 top (schematic designator R5)
R5_MOTOR3 "100k" RES_0402 -10.419,-6.281 r315 top (schematic designator R5)
R5_MOTOR4 "100k" RES_0402 -6.119,10.611 r225 top (schematic designator R5)
R6_MOTOR1 "4R7" RES_0402 10.457,-11.293 r315 bottom (schematic designator R6)
R6_MOTOR2 "4R7" RES_0402 11.009,10.391 r45 bottom (schematic designator R6)
R6_MOTOR3 "4R7" RES_0402 -10.888,-10.726 r225 bottom (schematic designator R6)
R6_MOTOR4 "4R7" RES_0402 -9.3,9.9 r135 bottom (schematic designator R6)
R7_MOTOR1 "4R7" RES_0402 11.28,-10.47 r315 bottom (schematic designator R7)
R7_MOTOR2 "4R7" RES_0402 9.509,11.991 r45 bottom (schematic designator R7)
R7_MOTOR3 "4R7" RES_0402 -7.491,-11.209 r225 top (schematic designator R7)
R7_MOTOR4 "4R7" RES_0402 -11.3,7.3 r135 bottom (schematic designator R7)
R8_MOTOR1 "4R7" RES_0402 13.396,-7.156 r0 bottom (schematic designator R8)
R8_MOTOR2 "4R7" RES_0402 7.709,13.791 r45 bottom (schematic designator R8)
R8_MOTOR3 "4R7" RES_0402 -8.2,-13.7 r225 bottom (schematic designator R8)
R8_MOTOR4 "4R7" RES_0402 -13.791,7.891 r135 bottom (schematic designator R8)
R9_MOTOR1 "10k" RES_0402 5.144,-7.699 r225 bottom (schematic designator R9)
R9_MOTOR2 "10k" RES_0402 2.666,-0.324 r45 bottom (schematic designator R9)
R9_MOTOR3 "10k" RES_0402 -11.849,-0.982 r315 bottom (schematic designator R9)
R9_MOTOR4 "10k" RES_0402 0.48,11.341 r225 bottom (schematic designator R9)
R10_MOTOR1 "10k" RES_0402 5.851,-8.407 r225 bottom (schematic designator R10)
R10_MOTOR2 "10k" RES_0402 1.959,0.383 r45 bottom (schematic designator R10)
R10_MOTOR3 "10k" RES_0402 -11.141,-0.275 r315 bottom (schematic designator R10)
R10_MOTOR4 "10k" RES_0402 1.187,10.634 r225 bottom (schematic designator R10)
R11_MOTOR1 "10k" RES_0402 6.558,-9.114 r225 bottom (schematic designator R11)
R11_MOTOR2 "10k" RES_0402 1.252,1.09 r45 bottom (schematic designator R11)
R11_MOTOR3 "10k" RES_0402 -10.434,0.432 r315 bottom (schematic designator R11)
R11_MOTOR4 "10k" RES_0402 1.894,9.927 r225 bottom (schematic designator R11)
R12_MOTOR1 "4R7" RES_0402 13.4,-6.3 r0 bottom (schematic designator R12)
R12_MOTOR2 "4R7" RES_0402 5.609,16.191 r45 bottom (schematic designator R12)
R12_MOTOR3 "4R7" RES_0402 -6.25,-15.625 r225 bottom (schematic designator R12)
R12_MOTOR4 "4R7" RES_0402 -16.2,5.9 r135 top (schematic designator R12)
R13_MOTOR1 "10k" RES_0402 4.437,-6.992 r45 bottom (schematic designator R13)
R13_MOTOR2 "10k" RES_0402 3.373,-1.031 r225 bottom (schematic designator R13)
R13_MOTOR3 "10k" RES_0402 -12.556,-1.689 r135 bottom (schematic designator R13)
R13_MOTOR4 "10k" RES_0402 -0.227,12.048 r45 bottom (schematic designator R13)
R14_MOTOR1 "10k" RES_0402 7.619,-6.639 r225 bottom (schematic designator R14)
R14_MOTOR2 "10k" RES_0402 0.191,-1.385 r45 bottom (schematic designator R14)
R14_MOTOR3 "10k" RES_0402 -12.909,1.492 r315 bottom (schematic designator R14)
R14_MOTOR4 "10k" RES_0402 2.955,12.402 r225 bottom (schematic designator R14)
R15_MOTOR1 "10k" RES_0402 7.265,-9.821 r45 bottom (schematic designator R15)
R15_MOTOR2 "10k" RES_0402 0.545,1.797 r225 bottom (schematic designator R15)
R15_MOTOR3 "10k" RES_0402 -9.691,1.191 r135 bottom (schematic designator R15)
R15_MOTOR4 "10k" RES_0402 2.601,9.22 r45 bottom (schematic designator R15)
R16_MOTOR1 "2k2" RES_0402 6.912,-5.932 r225 bottom (schematic designator R16)
R16_MOTOR2 "2k2" RES_0402 0.898,-2.092 r45 bottom (schematic designator R16)
R16_MOTOR3 "2k2" RES_0402 -13.616,0.785 r315 bottom (schematic designator R16)
R16_MOTOR4 "2k2" RES_0402 2.248,13.109 r225 bottom (schematic designator R16)
R17_MOTOR1 "2k2" RES_0402 8.326,-7.346 r225 bottom (schematic designator R17)
R17_MOTOR2 "2k2" RES_0402 -0.516,-0.678 r45 bottom (schematic designator R17)
R17_MOTOR3 "2k2" RES_0402 -12.202,2.2 r315 bottom (schematic designator R17)
R17_MOTOR4 "2k2" RES_0402 3.662,11.695 r225 bottom (schematic designator R17)
R18_MOTOR1 "2k2" RES_0402 9.033,-8.053 r225 bottom (schematic designator R18)
R18_MOTOR2 "2k2" RES_0402 -1.223,0.03 r45 bottom (schematic designator R18)
R18_MOTOR3 "2k2" RES_0402 -11.495,2.907 r315 bottom (schematic designator R18)
R18_MOTOR4 "2k2" RES_0402 4.369,10.988 r225 bottom (schematic designator R18)
R20_MOTOR1 "22k" RES_0402 1.703,-7.115 r135 top (schematic designator R20)
R20_MOTOR2 "22k" RES_0402 6.115,-1.203 r315 top (schematic designator R20)
R20_MOTOR3 "22k" RES_0402 -11.467,-3.43 r225 top (schematic designator R20)
R20_MOTOR4 "22k" RES_0402 -3.268,11.659 r135 top (schematic designator R20)
R22 "768k" RES_0402 15.757,-4.257 r315 top
R23 "100k" RES_0402 16.426,-3.588 r135 top
TP1 "TestPoint" TestPoint 8.214,-2.609 r90 top
TP2 "TestPoint" TestPoint 10,-9 r90 top
TP3 "TestPoint" TestPoint 9,-10 r90 top
TP4 "TestPoint" TestPoint -1.25,3 r90 top
TP5 "TestPoint" TestPoint -8.924,4.175 r90 top
TP6 "TestPoint" TestPoint 4.25,8.25 r90 top
TP11 "TestPoint" TestPoint 8.25,-4 r90 top
TP12 "TestPoint" TestPoint -1.368,1.378 r90 top
TP13 "TestPoint" TestPoint -9.784,5.034 r90 top
TP14 "TestPoint" TestPoint 4.75,9.404 r90 top
U1_MOTOR1 "MP6531AGR-Z" MP6531A-QFN40P400X400X100-29N 0.937,-13.321 r315 top (schematic designator U1)
U1_MOTOR2 "MP6531AGR-Z" MP6531A-QFN40P400X400X100-29N 6.873,5.297 r135 top (schematic designator U1)
U1_MOTOR3 "MP6531AGR-Z" MP6531A-QFN40P400X400X100-29N -5.527,-3.89 r45 top (schematic designator U1)
U1_MOTOR4 "MP6531AGR-Z" MP6531A-QFN40P400X400X100-29N -3.727,5.72 r315 top (schematic designator U1)
U2 "MIC5323-3.3YD5-TR" SPX3819M5-L-3-3/TR 14.309,-1.409 r270 bottom

## Footprints (in the part's own frame and the unit in brackets; to place one, negate y for a bottom-side part, rotate by r counter-clockwise, add the part's x,y. Pads: shape width x height; smd on the part's side, far side on the other; paste and mask are expansions set on the pad)
74438357010 [mm] "Power Inductors - SMD WE-MAPI 1uH 7.4A DCR=13.5mOhms AEC-Q200"
  rect 0.98x3.7 smd: 1(-1.185,0) 2(1.185,0)
  silkscreen extent -2.05,-2.05 2.05,2.05, body extent -2.05,-2.05 2.05,2.05, height 3.1
BatteryWireSoldering [mm]
  oval 2.8x3.3 hole 1.2 mask+0.035: 1(-1.7,0) 2(1.7,0)
CAP_0402 [mm] "generic 0402 cap footprint"
  rect 0.7x0.64 smd mask+0.05: 1(-0.5,0) 2(0.5,0)
  body extent -0.55,-0.3 0.55,0.3, height 0.6
CAP_0603_L [mm] "generic, 0.1mm longer (max pad-to-pad) for better hand-solderability"
  rect 0.8x0.95 smd mask+0.05: 1(-0.75,0) 2(0.75,0)
  body extent -0.95,-0.45 0.95,0.45, height 0.8
CAP_0805s [mm] "Chip Capacitor, 2-Leads, Body 2,00x1,25mm, IPC Medium Density"
  rect 1.15x1.45 smd mask+0.035: 1(-0.875,0) 2(0.875,0)
  body extent -1.1,-0.7 1.1,0.7, height 1.25
CAP_1210 [mm] "Chip Capacitor, 2-Leads, Body 3,20x2,5mm, IPC Medium Density"
  rect 1.3x2.65 smd: 1(-1.4,0) 2(1.4,0)
  silkscreen extent -0.35,-1.22 0.35,1.23, body extent -1.7,-1.3 1.7,1.3, height 2.6
CSD15571Q2 [mm]
  rect 0.4x0.455 smd mask+0.035: 1(-0.65,-0.923) 2(0,-0.923) 3(0.65,-0.923) 4(0.65,0.923) 5(0,0.923) 6(-0.65,0.923)
  rect 1.05x1.1 smd mask+0.035: 7(-0.325,0.001)
  rect 0.4x0.85 smd mask+0.035: 8(0.65,0.096)
  silkscreen extent -1.1,-1.1 -1.1,-0.72, body extent -1,-1 1,1, height 0.8
MP6531A-QFN40P400X400X100-29N [mm] "QFN40 for MP6531A"
  rect 0.85x0.2 smd paste-0.017 mask+0.035: 1(-1.95,1.2) 2(-1.95,0.8) 3(-1.95,0.4) 4(-1.95,0) 5(-1.95,-0.4) 6(-1.95,-0.8) 7(-1.95,-1.2) 15(1.95,-1.2) 16(1.95,-0.8) 17(1.95,-0.4) 18(1.95,0) 19(1.95,0.4) 20(1.95,0.8) 21(1.95,1.2)
  rect 0.2x0.85 smd paste-0.017 mask+0.035: 8(-1.2,-1.95) 9(-0.8,-1.95) 10(-0.4,-1.95) 11(0,-1.95) 12(0.4,-1.95) 13(0.8,-1.95) 14(1.2,-1.95) 22(1.2,1.95) 23(0.8,1.95) 24(0.4,1.95) 25(0,1.95) 26(-0.4,1.95) 27(-0.8,1.95) 28(-1.2,1.95)
  rect 2.65x2.65 smd paste-2539.97 mask+0.035: 29(0,0)
  silkscreen extent -2.4,-2.2 2.2,2.4, body extent -2,-2 2,2, height 0.95
NRPN032MAMS-RC [mm] "CONN HEADER SMD 6POS 2MM"
  rrect50% 1x2.25 smd mask+0.035: 1(2,2.275) 2(0,2.275) 3(-2,2.275) 4(2,-2.275) 5(0,-2.275) 6(-2,-2.275)
  silkscreen extent -3.15,-2.1 3.15,2.1, body extent -3,-3.25 3,3.25, height 5.95
RES_0402 [mm] "0402 Chip Resistor, 2-Leads, Body 1,00x0,5mm, IPC Medium Density"
  rect 0.7x0.64 smd mask+0.04: 1(-0.5,0) 2(0.5,0)
  body extent -0.55,-0.3 0.55,0.3, height 0.4
SHDRRA3W35P0X125_1X3_550X550X350P [mm]
  round 1 hole 0.7 mask+0.035: 1(1.25,0) 2(0,0) 3(-1.25,0)
  silkscreen extent -2.75,-1.05 2.75,3, body extent -2.75,-1.06 2.75,4.44, height 3.32
SOTFL50P160X60-6N [mm]
  rect 0.475x0.3 smd paste-0.009 mask+0.035: 1(-0.838,0.5) 2(-0.838,0) 3(-0.838,-0.5) 4(0.838,-0.5) 5(0.838,0) 6(0.838,0.5)
  silkscreen extent -1.07,0.9 -0.6,0.9, body extent -0.8,-0.8 0.8,0.8, height 0.6
SPX3819M5-L-3-3/TR [mm] "LDO Voltage Regulators 500mA LOW NOISE LDO"
  rect 0.69x0.99 smd: 1(-0.95,-1.295) 2(0,-1.295) 3(0.95,-1.295) 4(0.95,1.295) 5(-0.95,1.295)
  silkscreen extent -1.55,-2.04 -1,-1.41, body extent -1.45,-1.4 1.45,1.4, height 1.45
TestPoint [mm] "High-density test point, diameter 0.7mm (very small)"
  round 0.7 smd paste-0.35 mask+0.035: 1(0,0)
UFQFN28-STM32 [mm]
  rect 0.6x0.3 smd paste-0.02 mask+0.035: 1(-2.1,1.5) 2(-2.1,1) 3(-2.1,0.5) 4(-2.1,0) 5(-2.1,-0.5) 6(-2.1,-1) 7(-2.1,-1.5) 15(2.1,-1.5) 16(2.1,-1) 17(2.1,-0.5) 18(2.1,0) 19(2.1,0.5) 20(2.1,1) 21(2.1,1.5)
  rect 0.3x0.6 smd paste-0.02 mask+0.035: 8(-1.5,-2.1) 9(-1,-2.1) 10(-0.5,-2.1) 11(0,-2.1) 12(0.5,-2.1) 13(1,-2.1) 14(1.5,-2.1) 22(1.5,2.1) 23(1,2.1) 24(0.5,2.1) 25(0,2.1) 26(-0.5,2.1) 27(-1,2.1) 28(-1.5,2.1)
  silkscreen extent -2.37,-2.18 2.18,2.37, body extent -2,-2 2,2, height 0.55

## Part data
C1_MOTOR1 C1_MOTOR2 C1_MOTOR3 C1_MOTOR4 C12_MOTOR1 C12_MOTOR2 C12_MOTOR3 C12_MOTOR4 C17 C21: library part CAP_0603_X5R_25V, "Capacitor 0603 generic, X5R, 25V"
C2_MOTOR1 C2_MOTOR2 C2_MOTOR3 C2_MOTOR4 C3_MOTOR1 C3_MOTOR2 C3_MOTOR3 C3_MOTOR4 C4_MOTOR1 C4_MOTOR2 C4_MOTOR3 C4_MOTOR4 C5_MOTOR1 C5_MOTOR2 C5_MOTOR3 C5_MOTOR4 C8_MOTOR1 C8_MOTOR2 C8_MOTOR3 C8_MOTOR4 C9_MOTOR1 C9_MOTOR2 C9_MOTOR3 C9_MOTOR4 C13_MOTOR1 C13_MOTOR2 C13_MOTOR3 C13_MOTOR4 C14_MOTOR1 C14_MOTOR2 C14_MOTOR3 C14_MOTOR4 C20: library part CAP_0402_X5R_25V, "Capacitor 0402 generic, X5R, 25V"
C6_MOTOR1 C6_MOTOR2 C6_MOTOR3 C6_MOTOR4: library part CAP_0402, "Capacitor 0402 generic"
C7_MOTOR1 C7_MOTOR2 C7_MOTOR3 C7_MOTOR4 C16: library part MCAST21GBB5106KTNA01, "Multilayer Ceramic Capacitors MLCC - SMD/SMT 25V 10uF X5R 0805 10%", Manufacturer_Name="TAIYO YUDEN", Datasheet Link=https://www.mouser.com/catalog/specsheets/Taiyo%20Yuden_1102023_MC_mlcc_all_e.pdf, Manufacturer_Part_Number=MCAST21GBB5106KTNA01
C10_MOTOR1 C10_MOTOR2 C10_MOTOR3 C10_MOTOR4 C11_MOTOR1 C11_MOTOR2 C11_MOTOR3 C11_MOTOR4 C18 C19: library part GXT21BR61C226ME13L, "Multilayer Ceramic Capacitors MLCC - SMD/SMT 0805 16VDC 22uF 20% X5R AEC-Q200", Manufacturer_Name="Murata Electronics", Datasheet Link=https://www.mouser.de/datasheet/3/76/4/GXT21BR61C226ME13_01A.pdf, Manufacturer_Part_Number=GXT21BR61C226ME13L
C15: library part MSASE32MAB5107MPNA01, "Multilayer Ceramic Capacitors MLCC - SMD/SMT 16V 100uF X5R 1210 20 %", Manufacturer_Name="TAIYO YUDEN", Mouser Part Number=963-MSASE32MAB5107MP, Datasheet Link=https://www.mouser.com/catalog/specsheets/Tayio_Yuden_1102023_MS_mlcc_all_e.pdf?_gl=1*1rxg4sj*_gcl_aw*R0NMLjE3ODg0ODY5MTcuQ2p3S0NBand3SnpQQmhCUkVpd0FKZkhSblM5ekZUOGFxTzJkNFhkWjRHZDBxQk1uWEFQeTNmZmF0eVh2MzN0WXVpZGxzbWlweWtiRWR4b0NrX3NRQXZEX0J3RQ..*_gcl_au*MTk2MDIwMzcyMS4xNzg3MTYzOTg5LjE1NDU2MTg1LjE3ODgzMTM3ODEuMTc4ODMxMzc4Ny4zOTIwMDAxODQuMTc4ODMxMzc4MS4xNzg4MzEzNzg3*_ga*NTU1NDc1MzkuMTc2MzAwODA1OQ..*_ga_15W4STQT4T*czE3ODg4NzY3NDUkbzIxNiRnMCR0MTc4ODg3ODI1NSRqNjAkbDAkaDA., Height=2.5mm, Manufacturer_Part_Number=MSASE32MAB5107MPNA01, Mouser Price/Stock=https://www.mouser.co.uk/ProductDetail/Wurth-Elektronik/865080343009?qs=0KOYDY2FL28Gid9q%2FqirTQ%3D%3D
H1: "Manual soldering pads (TH), for BT2.0 pigtails using 22awg silicone wiring"
H3 H4 H5 H6: "CONN HEADER SMD 6POS 2MM"
IC1_MOTOR1 IC1_MOTOR2 IC1_MOTOR3 IC1_MOTOR4: "Integrated Circuit", Manufacturer_Name=STMicroelectronics, Mouser Part Number=511-STM32G071GBU6, Arrow Part Number=STM32G071GBU6, Arrow Price/Stock=https://www.arrow.com/en/products/stm32g071gbu6/stmicroelectronics?region=nac, Datasheet Link=https://www.st.com/resource/en/datasheet/stm32g071c8.pdf, Height=0.6mm, Manufacturer_Part_Number=STM32G071GBU6, Mouser Price/Stock=https://www.mouser.co.uk/ProductDetail/STMicroelectronics/STM32G071GBU6?qs=PqoDHHvF64%2FgmAx6dD98Vg%3D%3D
IC2: "Switching Voltage Regulators 3.7-A boost converte r with 0.5-V ultra- A 595-TPS61023DRLR", Manufacturer_Name="Texas Instruments", Mouser Part Number=595-TPS61023DRLT, Arrow Part Number=TPS61023DRLT, Arrow Price/Stock=https://www.arrow.com/en/products/tps61023drlt/texas-instruments.html?utm_currency=USD&region=nac, Datasheet Link=http://www.ti.com/general/docs/suppproductinfo.tsp?distId=10&gotoUrl=http%3A%2F%2Fwww.ti.com%2Flit%2Fgpn%2Ftps61023, Height=0.6mm, Manufacturer_Part_Number=TPS61023DRLT, Mouser Price/Stock=https://www.mouser.co.uk/ProductDetail/Texas-Instruments/TPS61023DRLT?qs=BJlw7L4Cy78Zr3IJIU3gNw%3D%3D
J1_MotorConnection1 J1_MotorConnection2 J1_MotorConnection3 J1_MotorConnection4: "Connector JST 1.25mm pitch THT", Manufacturer_Name=Molex, Mouser Part Number=538-53048-0310, Datasheet Link=https://www.molex.com/pdm_docs/sd/530481010_sd.pdf, Height=3.5mm, Manufacturer_Part_Number=53048-0310, Mouser Price/Stock=https://www.mouser.co.uk/ProductDetail/Molex/53048-0310?qs=zXrbR4Jv0OfUlEeVnlaifA%3D%3D
L1: library part 74438357010, "Power Inductors - SMD WE-MAPI 1uH 7.4A DCR=13.5mOhms AEC-Q200", Manufacturer_Name="Wurth Elektronik", Mouser Part Number=710-74438357010, Arrow Part Number=74438357010, Arrow Price/Stock=null?utm_currency=USD&region=asia, Datasheet Link=https://www.we-online.com/catalog/datasheet/74438357010.pdf, Height=3.1mm, Manufacturer_Part_Number=74438357010, Mouser Price/Stock=https://www.mouser.co.uk/ProductDetail/Wurth-Elektronik/74438357010?qs=AQlKX63v8RstGPuQmrueWg%3D%3D
Q1_MOTOR1 Q1_MOTOR2 Q1_MOTOR3 Q1_MOTOR4 Q2_MOTOR1 Q2_MOTOR2 Q2_MOTOR3 Q2_MOTOR4 Q3_MOTOR1 Q3_MOTOR2 Q3_MOTOR3 Q3_MOTOR4 Q4_MOTOR1 Q4_MOTOR2 Q4_MOTOR3 Q4_MOTOR4 Q5_MOTOR1 Q5_MOTOR2 Q5_MOTOR3 Q5_MOTOR4 Q6_MOTOR1 Q6_MOTOR2 Q6_MOTOR3 Q6_MOTOR4: "MOSFET 20V N-Channel NexFET Pwr MOSFET", Manufacturer_Name="Texas Instruments", Mouser Part Number=595-CSD15571Q2, Arrow Part Number=CSD15571Q2, Arrow Price/Stock=https://www.arrow.com/en/products/csd15571q2/texas-instruments, Datasheet Link=http://www.ti.com/lit/gpn/csd15571q2, Height=0.8mm, Manufacturer_Part_Number=CSD15571Q2, Mouser Price/Stock=https://www.mouser.co.uk/ProductDetail/Texas-Instruments/CSD15571Q2?qs=OGNXFUZBARuNT0xCwaBM7Q%3D%3D
R1_MOTOR1 R1_MOTOR2 R1_MOTOR3 R1_MOTOR4 R3_MOTOR1 R3_MOTOR2 R3_MOTOR3 R3_MOTOR4 R6_MOTOR1 R6_MOTOR2 R6_MOTOR3 R6_MOTOR4 R7_MOTOR1 R7_MOTOR2 R7_MOTOR3 R7_MOTOR4 R8_MOTOR1 R8_MOTOR2 R8_MOTOR3 R8_MOTOR4 R12_MOTOR1 R12_MOTOR2 R12_MOTOR3 R12_MOTOR4: library part RC0402FR-7W4R7L, "Thick Film Resistors - SMD General Purpose Chip Resistor 0402, 4.7Ohms, 1%, 1/16W", Manufacturer_Name=YAGEO, Manufacturer_Part_Number=RC0402FR-7W4R7L
R2_MOTOR1 R2_MOTOR2 R2_MOTOR3 R2_MOTOR4 R20_MOTOR1 R20_MOTOR2 R20_MOTOR3 R20_MOTOR4: library part RES_0402, "Resistor 0402 generic, 1/16W"
R4_MOTOR1 R4_MOTOR2 R4_MOTOR3 R4_MOTOR4 R16_MOTOR1 R16_MOTOR2 R16_MOTOR3 R16_MOTOR4 R17_MOTOR1 R17_MOTOR2 R17_MOTOR3 R17_MOTOR4 R18_MOTOR1 R18_MOTOR2 R18_MOTOR3 R18_MOTOR4: library part AC0402FR-7D2K2L, "Thick Film Resistors - SMD 2.2 kOhms 1/16 W 50 V 1 % 0402 100 PPM / C - 55 C / + 155 C AEC-Q200", Manufacturer_Name=YAGEO, Manufacturer_Part_Number=AC0402FR-7D2K2L
R5_MOTOR1 R5_MOTOR2 R5_MOTOR3 R5_MOTOR4 R23: library part AE0402BR-07100KL, "Thick Film Resistors - SMD 100KOhm 0402 1/3W 0.1% Hal Free AEC-Q200", Manufacturer_Name=YAGEO, Datasheet Link=https://yageogroup.com/content/datasheet/asset/file/PYU-AE_51_ROHS_L, Manufacturer_Part_Number=AE0402BR-07100KL
R9_MOTOR1 R9_MOTOR2 R9_MOTOR3 R9_MOTOR4 R10_MOTOR1 R10_MOTOR2 R10_MOTOR3 R10_MOTOR4 R11_MOTOR1 R11_MOTOR2 R11_MOTOR3 R11_MOTOR4 R13_MOTOR1 R13_MOTOR2 R13_MOTOR3 R13_MOTOR4 R14_MOTOR1 R14_MOTOR2 R14_MOTOR3 R14_MOTOR4 R15_MOTOR1 R15_MOTOR2 R15_MOTOR3 R15_MOTOR4: library part RES_0402_1PERCENT, "Resistor 0402 generic, 1/16W, 1%"
R22: library part AC0402FR-07768KL, "Thick Film Resistors - SMD 768 kOhms 1/16 W 50 V 1 % 0402 100 PPM / C - 55 C / + 155 C AEC-Q200", Manufacturer_Name=YAGEO, Datasheet Link=https://www.mouser.de/datasheet/3/508/1/PYu-AC_51_RoHS_L_11.pdf, Manufacturer_Part_Number=AC0402FR-07768KL
TP1 TP2 TP3 TP4 TP5 TP6 TP11 TP12 TP13 TP14: "High density testpoint, diameter 0.7mm (very small)"
U1_MOTOR1 U1_MOTOR2 U1_MOTOR3 U1_MOTOR4: "Integrated Circuit", Manufacturer_Name="Monolithic Power Systems (MPS)", Mouser Part Number=946-MP6531AGR-Z, Datasheet Link=https://www.monolithicpower.com/en/documentview/productdocument/index/version/2/document_type/Datasheet/lang/en/sku/MP6531A/document_id/1862/, Height=1mm, Manufacturer_Part_Number=MP6531AGR-Z, Mouser Price/Stock=https://www.mouser.co.uk/ProductDetail/Monolithic-Power-Systems-MPS/MP6531AGR-Z?qs=5aG0NVq1C4xl7PDY2hKmEA%3D%3D
U2: "LDO Voltage Regulators 300mA uCap ULDO High PSRR Low Noise Regulator", Manufacturer_Name="Microchip Technology", Datasheet Link=https://www.mouser.de/datasheet/3/282/1/MIC5323.pdf, Manufacturer_Part_Number=MIC5323-3.3YD5-TR

## Via types
v1: diameter 0.45, hole 0.25, Top Layer to Bottom Layer, tented both sides, 381 vias
v2: diameter 0.55, hole 0.25, Top Layer to Bottom Layer, tented both sides, 93 vias

## Nets (pads, with @x,y where several pads share a name; then routed paths per layer and width w, separated by ;. In a path a pad name is that pad's centre, name@x,y a point inside that pad or via, vN(x,y) a via of type N, cw(c..) or ccw(c..) an arc to the next point about the centre after c; other vN are vias at no path point)
+3V3: C1_MOTOR1.2 C1_MOTOR2.2 C1_MOTOR3.2 C1_MOTOR4.2 C2_MOTOR1.2 C2_MOTOR2.2 C2_MOTOR3.2 C2_MOTOR4.2 C21.2 IC1_MOTOR1.3 IC1_MOTOR2.3 IC1_MOTOR3.3 IC1_MOTOR4.3 R20_MOTOR1.2 R20_MOTOR2.2 R20_MOTOR3.2 R20_MOTOR4.2 TP1.1 U2.5 | length 80.3
  Top Layer w0.15: C2_MOTOR3.2@-13.505,-0.483 -13.495,-0.471 -13.488,-0.458 -13.483,-0.444 -13.482,-0.428 C2_MOTOR3.2@-13.482,-0.39 ; C2_MOTOR4.2@-0.32,13.697 -0.309,13.687 -0.296,13.68 -0.281,13.676 -0.266,13.675 C2_MOTOR4.2@-0.227,13.675 ; R20_MOTOR1.2@1.314,-6.614 1.032,-6.332 1.009,-6.305 0.993,-6.274 0.983,-6.241 0.98,-6.205 0.98,-6.155 0.981,-6.135 0.987,-6.117 0.996,-6.1 1.009,-6.085 3.077,-4.016 ; C2_MOTOR1.2@4.557,-5.255 4.56,-5.256 4.558,-5.259 4.551,-5.267 4.547,-5.272 4.544,-5.278 4.542,-5.284 4.541,-5.29 4.541,-5.61 4.542,-5.616 4.544,-5.622 4.547,-5.628 4.551,-5.633 4.557,-5.639 4.56,-5.642 4.561,-5.645 4.562,-5.648 4.563,-5.652 4.563,-5.95 4.569,-6.02 4.588,-6.085 4.62,-6.144 4.665,-6.198 4.758,-6.291 4.772,-6.308 4.782,-6.327 4.788,-6.348 4.791,-6.37 IC1_MOTOR1.3@4.791,-6.427
  Top Layer w0.2: C2_MOTOR3.2@-13.461,-0.411 -13.128,-0.411 -13.121,-0.41 -13.115,-0.408 -13.11,-0.405 -13.105,-0.401 -13.098,-0.395 -13.096,-0.392 -13.093,-0.391 -13.089,-0.39 -13.086,-0.39 -12.915,-0.39 -12.847,-0.383 -12.785,-0.365 -12.728,-0.334 -12.676,-0.291 IC1_MOTOR3.3@-12.421,-0.036 ; C2_MOTOR4.2@-0.248,13.653 -0.248,13.32 -0.248,13.314 -0.246,13.308 -0.243,13.302 -0.239,13.297 -0.232,13.291 -0.23,13.288 -0.229,13.285 -0.228,13.282 -0.227,13.278 -0.227,13.111 -0.221,13.042 -0.202,12.978 -0.17,12.92 -0.126,12.866 IC1_MOTOR4.3@0.126,12.614 ; R20_MOTOR1.2@1.314,-6.614 1.329,-6.633 1.341,-6.653 1.347,-6.676 1.349,-6.7 R20_MOTOR1.2@1.349,-6.761 ; IC1_MOTOR2.3@3.019,-1.597 3.276,-1.853 3.319,-1.904 3.349,-1.96 3.367,-2.021 3.373,-2.087 3.373,-2.255 3.374,-2.262 3.375,-2.268 3.378,-2.273 3.383,-2.278 3.389,-2.285 3.391,-2.287 3.393,-2.29 3.394,-2.294 3.394,-2.297 3.394,-2.48 3.401,-2.555 3.422,-2.625 3.456,-2.688 C2_MOTOR2.2@3.505,-2.746
  Top Layer w0.3: v1@-2.49,-1.165 -2.485,-1.227 -2.468,-1.284 -2.44,-1.336 -2.4,-1.383 -2.083,-1.701 -2.059,-1.729 -2.042,-1.76 -2.032,-1.794 -2.029,-1.83 -2.029,-1.923 -2.023,-1.989 -2.005,-2.05 -1.974,-2.107 -1.932,-2.158 -1.758,-2.332 -1.707,-2.374 -1.65,-2.405 -1.589,-2.423 -1.523,-2.429 -1.43,-2.429 -1.394,-2.432 -1.36,-2.442 -1.329,-2.459 -1.301,-2.483 -0.763,-3.02 -0.762,-3.022 -0.761,-3.024 -0.76,-3.025 -0.76,-3.027 ; C2_MOTOR2.2@3.505,-2.746 3.722,-2.964 3.816,-3.042 3.919,-3.098 4.031,-3.131 4.152,-3.142 6.047,-3.142 ; 6.051,-3.144 6.052,-3.145 ; 6.055,-3.146 6.642,-3.146 6.807,-3.131 6.959,-3.086 7.099,-3.01 7.226,-2.904 7.521,-2.609 ; R20_MOTOR2.2@6.469,-1.557 7.521,-2.609 ; v1(9.609,-1.907) 9.022,-2.494 8.961,-2.544 8.895,-2.58 8.822,-2.602 8.744,-2.609 8.546,-2.609 8.398,-2.609 8.25,-2.609 8.102,-2.609 7.954,-2.609 7.521,-2.609
  Top Layer w0.4: v1(-14.562,-2.086) -14.557,-2.081 -14.555,-2.078 -14.554,-2.076 -14.553,-2.073 -14.553,-2.07 -14.553,-1.929 -14.547,-1.873 -14.532,-1.822 -14.507,-1.775 -14.471,-1.732 -14.315,-1.575 -14.275,-1.528 -14.247,-1.476 -14.23,-1.42 -14.224,-1.358 -14.224,-1.273 -14.221,-1.239 -14.212,-1.208 -14.197,-1.179 -14.175,-1.153 C2_MOTOR3.2@-13.505,-0.483 ; v1@-2.49,-1.165 -2.49,-1.013 -2.491,-1.011 -2.491,-1.01 -2.492,-1.008 -2.493,-1.007 -2.496,-1.004 -2.498,-1.002 v1(-2.5,-1) -2.5,-0.997 -2.5,-0.994 -2.5,-0.049 -2.493,0.032 -2.47,0.108 -2.433,0.177 -2.38,0.24 -2.238,0.382 -2.236,0.384 -2.235,0.387 -2.234,0.39 -2.234,0.393 v1(-2.234,0.4) ; C1_MOTOR4.2@-1.04,14.417 C1_MOTOR4.2@-0.987,14.364 ; -0.76,-3.027 -0.76,-3.033 -0.76,-3.036 -0.759,-3.039 -0.757,-3.043 -0.755,-3.045 -0.521,-3.279 -0.421,-3.362 -0.311,-3.422 -0.19,-3.458 -0.06,-3.47 1.401,-3.47 1.419,-3.471 1.436,-3.476 1.451,-3.485 1.465,-3.496 1.483,-3.514 1.491,-3.521 1.5,-3.525 1.509,-3.528 1.519,-3.529 2.011,-3.529 2.045,-3.526 2.077,-3.516 2.106,-3.501 2.133,-3.478 2.167,-3.444 2.181,-3.432 2.197,-3.424 2.215,-3.418 2.234,-3.417 2.444,-3.417 2.46,-3.418 2.475,-3.423 2.489,-3.43 2.501,-3.44 C1_MOTOR2.2@2.53,-3.47 ; C2_MOTOR4.2@-0.32,13.697 C1_MOTOR4.2@-0.987,14.364 ; v1(0.1,14.6) 0.093,14.6 0.09,14.6 0.087,14.599 0.084,14.598 0.082,14.596 0.071,14.584 0.064,14.579 0.057,14.575 0.049,14.573 0.04,14.572 -0.422,14.572 -0.458,14.568 -0.491,14.559 -0.522,14.542 -0.55,14.519 -0.615,14.454 -0.662,14.415 -0.714,14.387 -0.77,14.37 -0.832,14.364 C1_MOTOR4.2@-0.987,14.364 ; C2_MOTOR2.2@3.343,-2.657 C1_MOTOR2.2@2.53,-3.47 ; C2_MOTOR1.2@4.557,-5.255 4.55,-5.255 4.545,-5.255 4.54,-5.254 4.536,-5.251 4.532,-5.248 3.886,-4.602 3.866,-4.585 3.843,-4.573 3.818,-4.566 3.792,-4.563 3.724,-4.563 3.676,-4.559 3.631,-4.545 3.59,-4.523 3.553,-4.492 3.077,-4.016 C1_MOTOR2.2@2.53,-3.47
  Bottom Layer w0.15: v1(-3.621,12.013) -3.621,12.058 -3.623,12.075 -3.628,12.091 -3.636,12.106 -3.647,12.12 -3.68,12.153 -3.701,12.178 -3.716,12.206 -3.725,12.236 -3.728,12.269 -3.728,14.297 -3.719,14.396 -3.691,14.488 -3.646,14.573 -3.582,14.649 -3.484,14.748 -3.441,14.783 -3.395,14.808 -3.344,14.823 -3.29,14.828 -2.099,14.828 -1.996,14.818 -1.901,14.79 -1.813,14.743 -1.733,14.676 -1.631,14.574 -1.588,14.538 -1.539,14.512 -1.487,14.496 -1.43,14.491 -0.16,14.491 -0.126,14.494 -0.095,14.503 -0.067,14.519 -0.041,14.54 -0.007,14.574 0.007,14.585 0.021,14.594 0.038,14.598 0.055,14.6 0.08,14.6 0.09,14.6 v1(0.1,14.6) 0.11,14.6 v1@0.12,14.6
  Bottom Layer w0.3: v1(9.609,-1.907) 9.8,-1.715 9.883,-1.647 9.973,-1.598 10.071,-1.569 10.178,-1.559 11.777,-1.559 11.793,-1.56 11.807,-1.565 11.82,-1.572 C21.2@11.832,-1.582
  Bottom Layer w0.4: v1@-14.591,-2.112 -14.591,-2.676 -14.57,-2.899 -14.509,-3.106 -14.406,-3.295 -14.263,-3.468 -13.924,-3.807 -13.778,-3.929 -13.618,-4.015 -13.443,-4.067 -13.254,-4.085 -12.376,-4.085 -12.291,-4.077 -12.213,-4.054 -12.142,-4.015 -12.076,-3.961 -11.993,-3.877 -11.957,-3.847 -11.918,-3.826 -11.875,-3.813 -11.828,-3.809 -11.275,-3.809 -11.057,-3.789 -10.855,-3.729 -10.67,-3.629 -10.502,-3.489 -9.736,-2.723 -9.413,-2.455 -9.058,-2.263 -8.672,-2.147 -8.253,-2.109 -7.669,-2.109 -7.439,-2.088 -7.226,-2.025 -7.031,-1.919 -6.853,-1.771 -6.429,-1.347 -6.247,-1.195 -6.046,-1.087 -5.828,-1.022 -5.591,-1 v1(-2.5,-1) ; v1@-14.588,-2.109 v1@-14.587,-2.109 ; v1@-14.584,-2.108 v1(-14.562,-2.086) ; v1(-2.234,0.4) -2.234,0.404 -2.234,0.406 -2.233,0.408 -2.232,0.409 -2.231,0.41 -1.054,1.588 -0.895,1.778 -0.782,1.988 -0.714,2.217 -0.691,2.464 -0.691,2.809 -0.679,2.945 -0.641,3.07 -0.579,3.186 -0.491,3.291 5.136,8.918 5.446,9.29 5.667,9.699 5.799,10.144 5.843,10.625 5.843,11.303 5.819,11.569 5.745,11.816 5.623,12.042 5.451,12.249 4.755,12.945 4.643,13.079 4.564,13.226 4.516,13.387 4.5,13.56 4.5,13.802 4.491,13.897 4.465,13.986 4.421,14.066 4.36,14.14 4.17,14.33 4.028,14.448 3.872,14.532 3.702,14.583 3.518,14.6 v1@0.12,14.6
  Bottom Layer w0.5: C21.2@11.832,-1.582 11.847,-1.597 11.853,-1.602 11.86,-1.606 11.868,-1.608 11.876,-1.609 12.351,-1.609 12.475,-1.598 12.59,-1.563 12.695,-1.506 12.791,-1.427 12.914,-1.304 12.958,-1.251 12.989,-1.194 13.008,-1.13 13.014,-1.062 U2.5@13.014,-0.459
  other v2: -11.891,-3.809
+3V3_BYP: C20.2 U2.4 | length 1
  Bottom Layer w0.4: U2.4@13.014,-2.359 13.018,-2.363 13.02,-2.365 13.021,-2.367 13.021,-2.369 13.022,-2.372 13.022,-3.343 13.022,-3.346 13.023,-3.348 13.024,-3.35 13.025,-3.352 C20.2@13.029,-3.356